# Altium PCB GTV4.0-V16_Lite.PcbDoc (part 1 of 7)
Units mil, origin at the board's own origin, x right, y up, seen from the top; angles counter-clockwise.
Board outline 5582.68 x 4389.76 mil, 4 copper layers (Top Layer, Layer 1, Layer 2, Bottom Layer), stack 62.631 mil thick; 269 components, 191 nets, 849 pads, 375 vias.
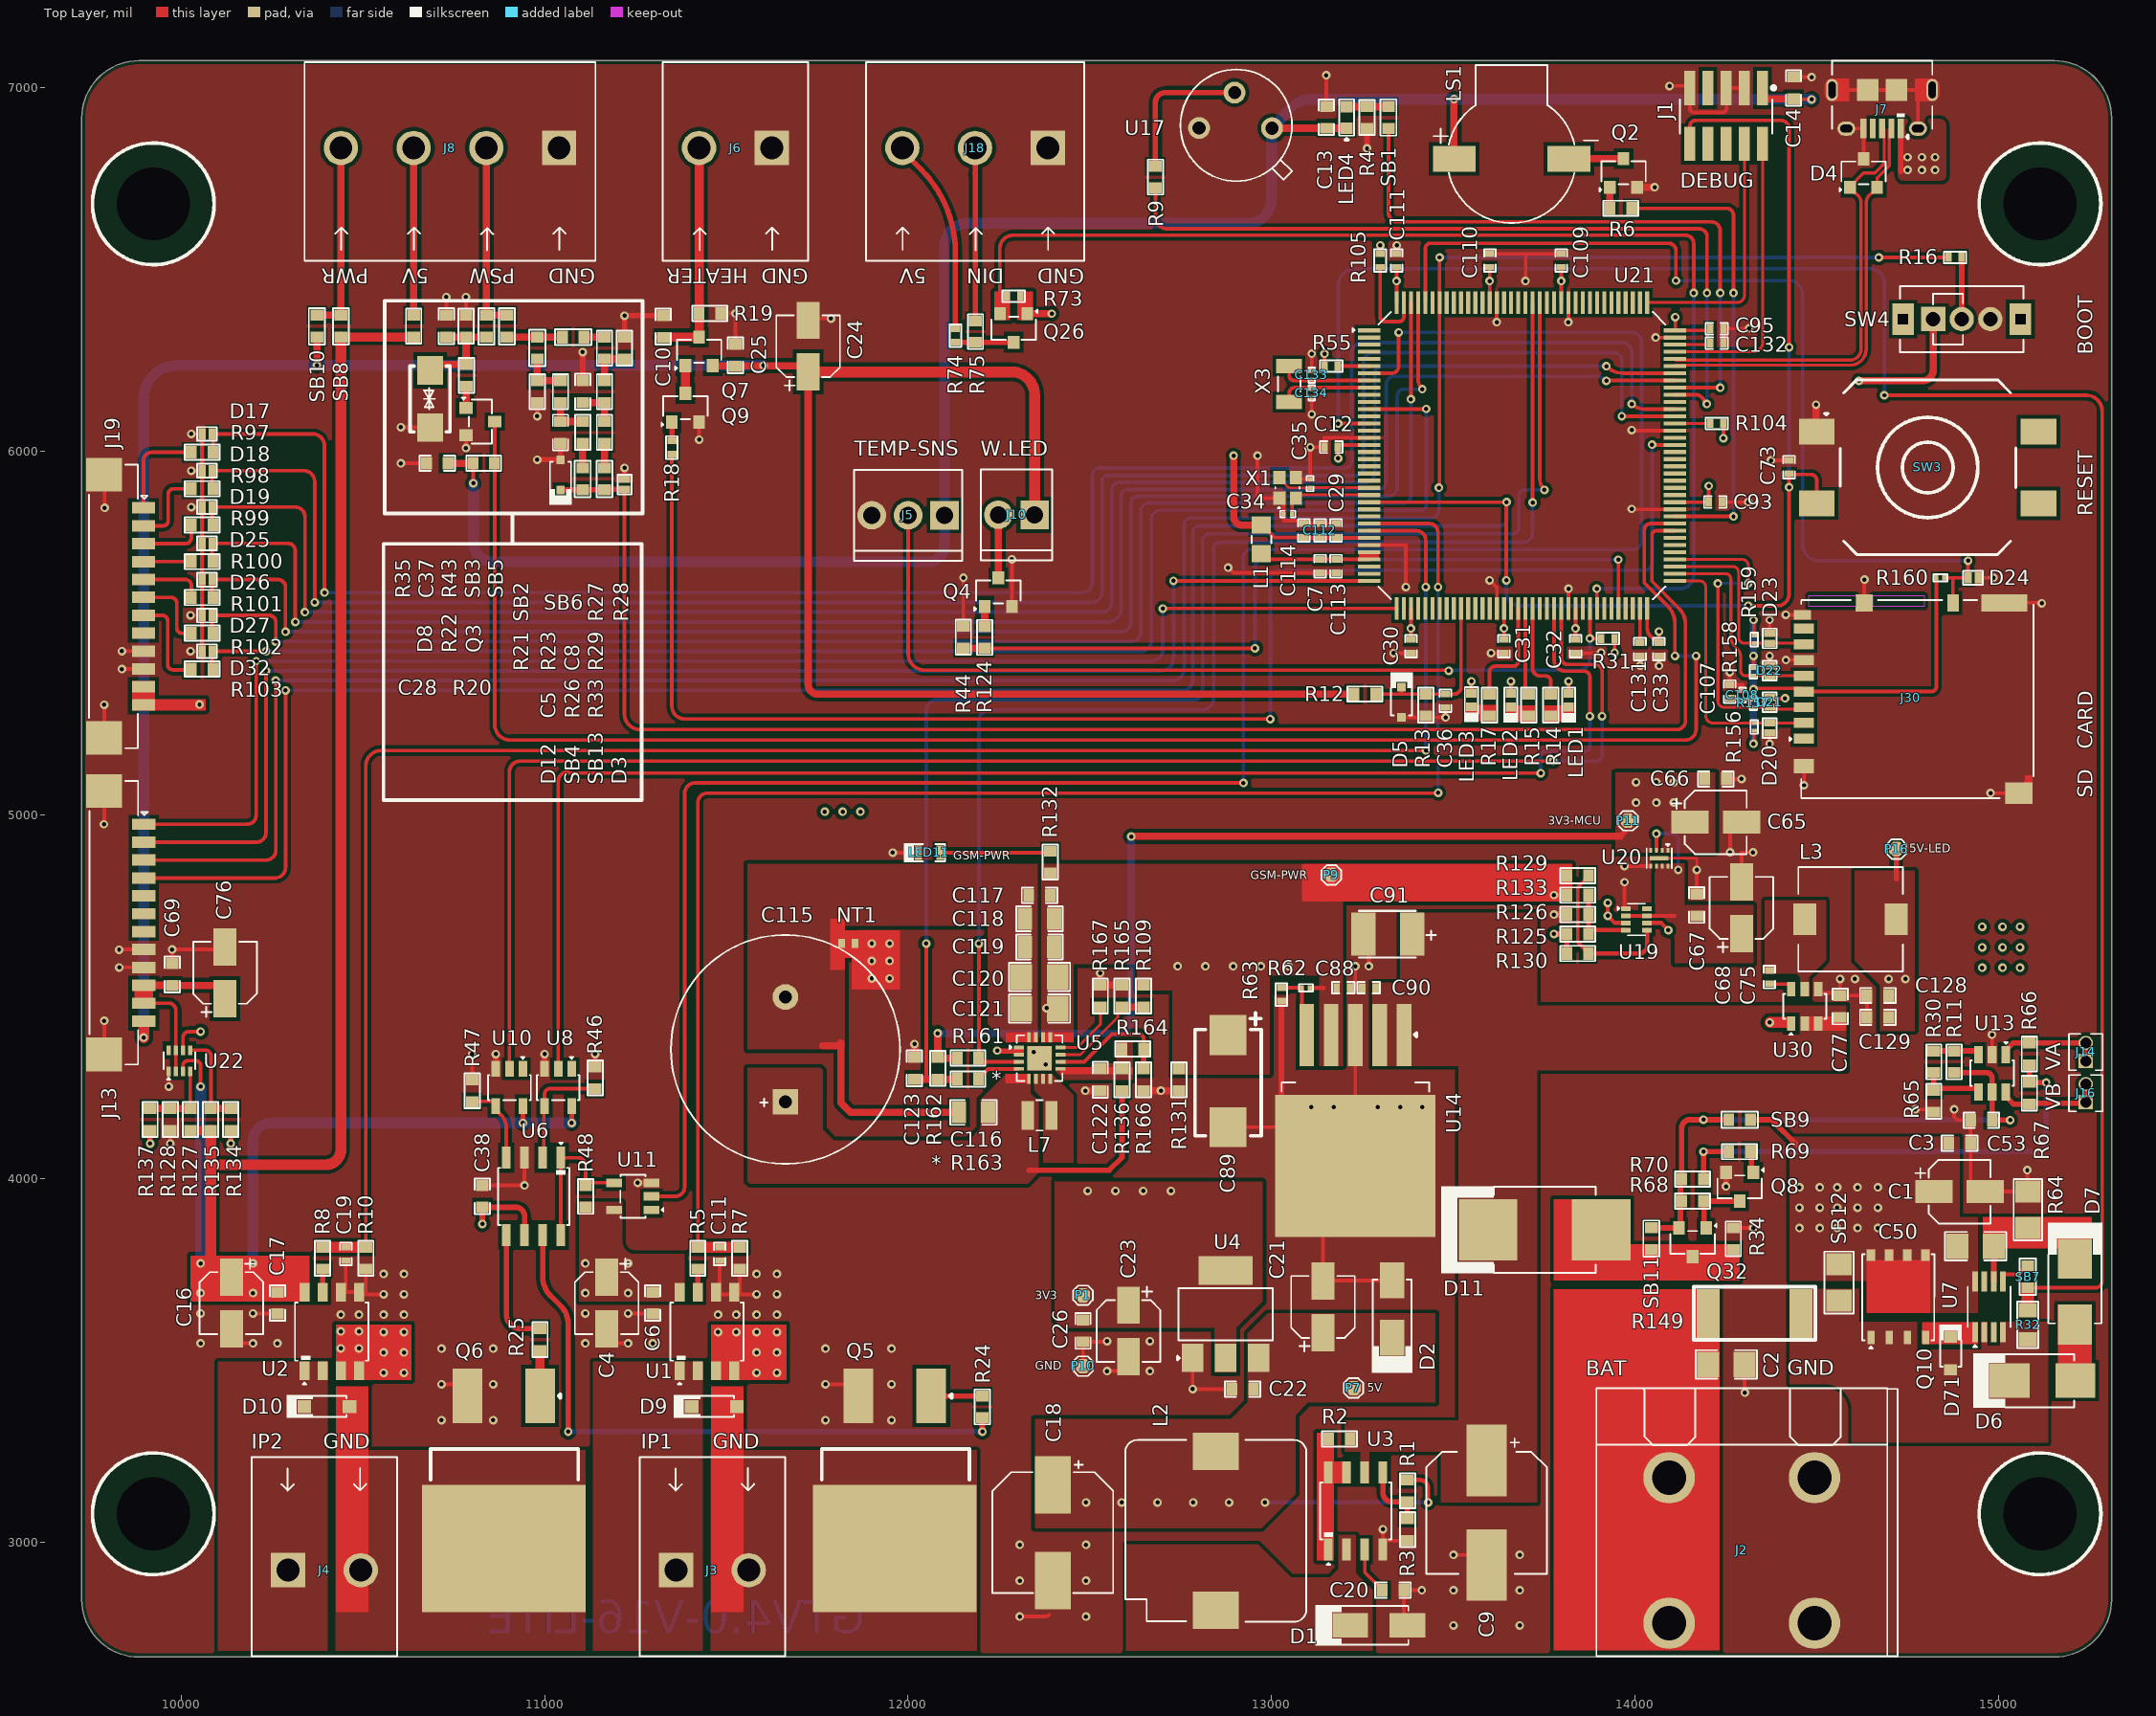
[diagram p0: Top Layer view]
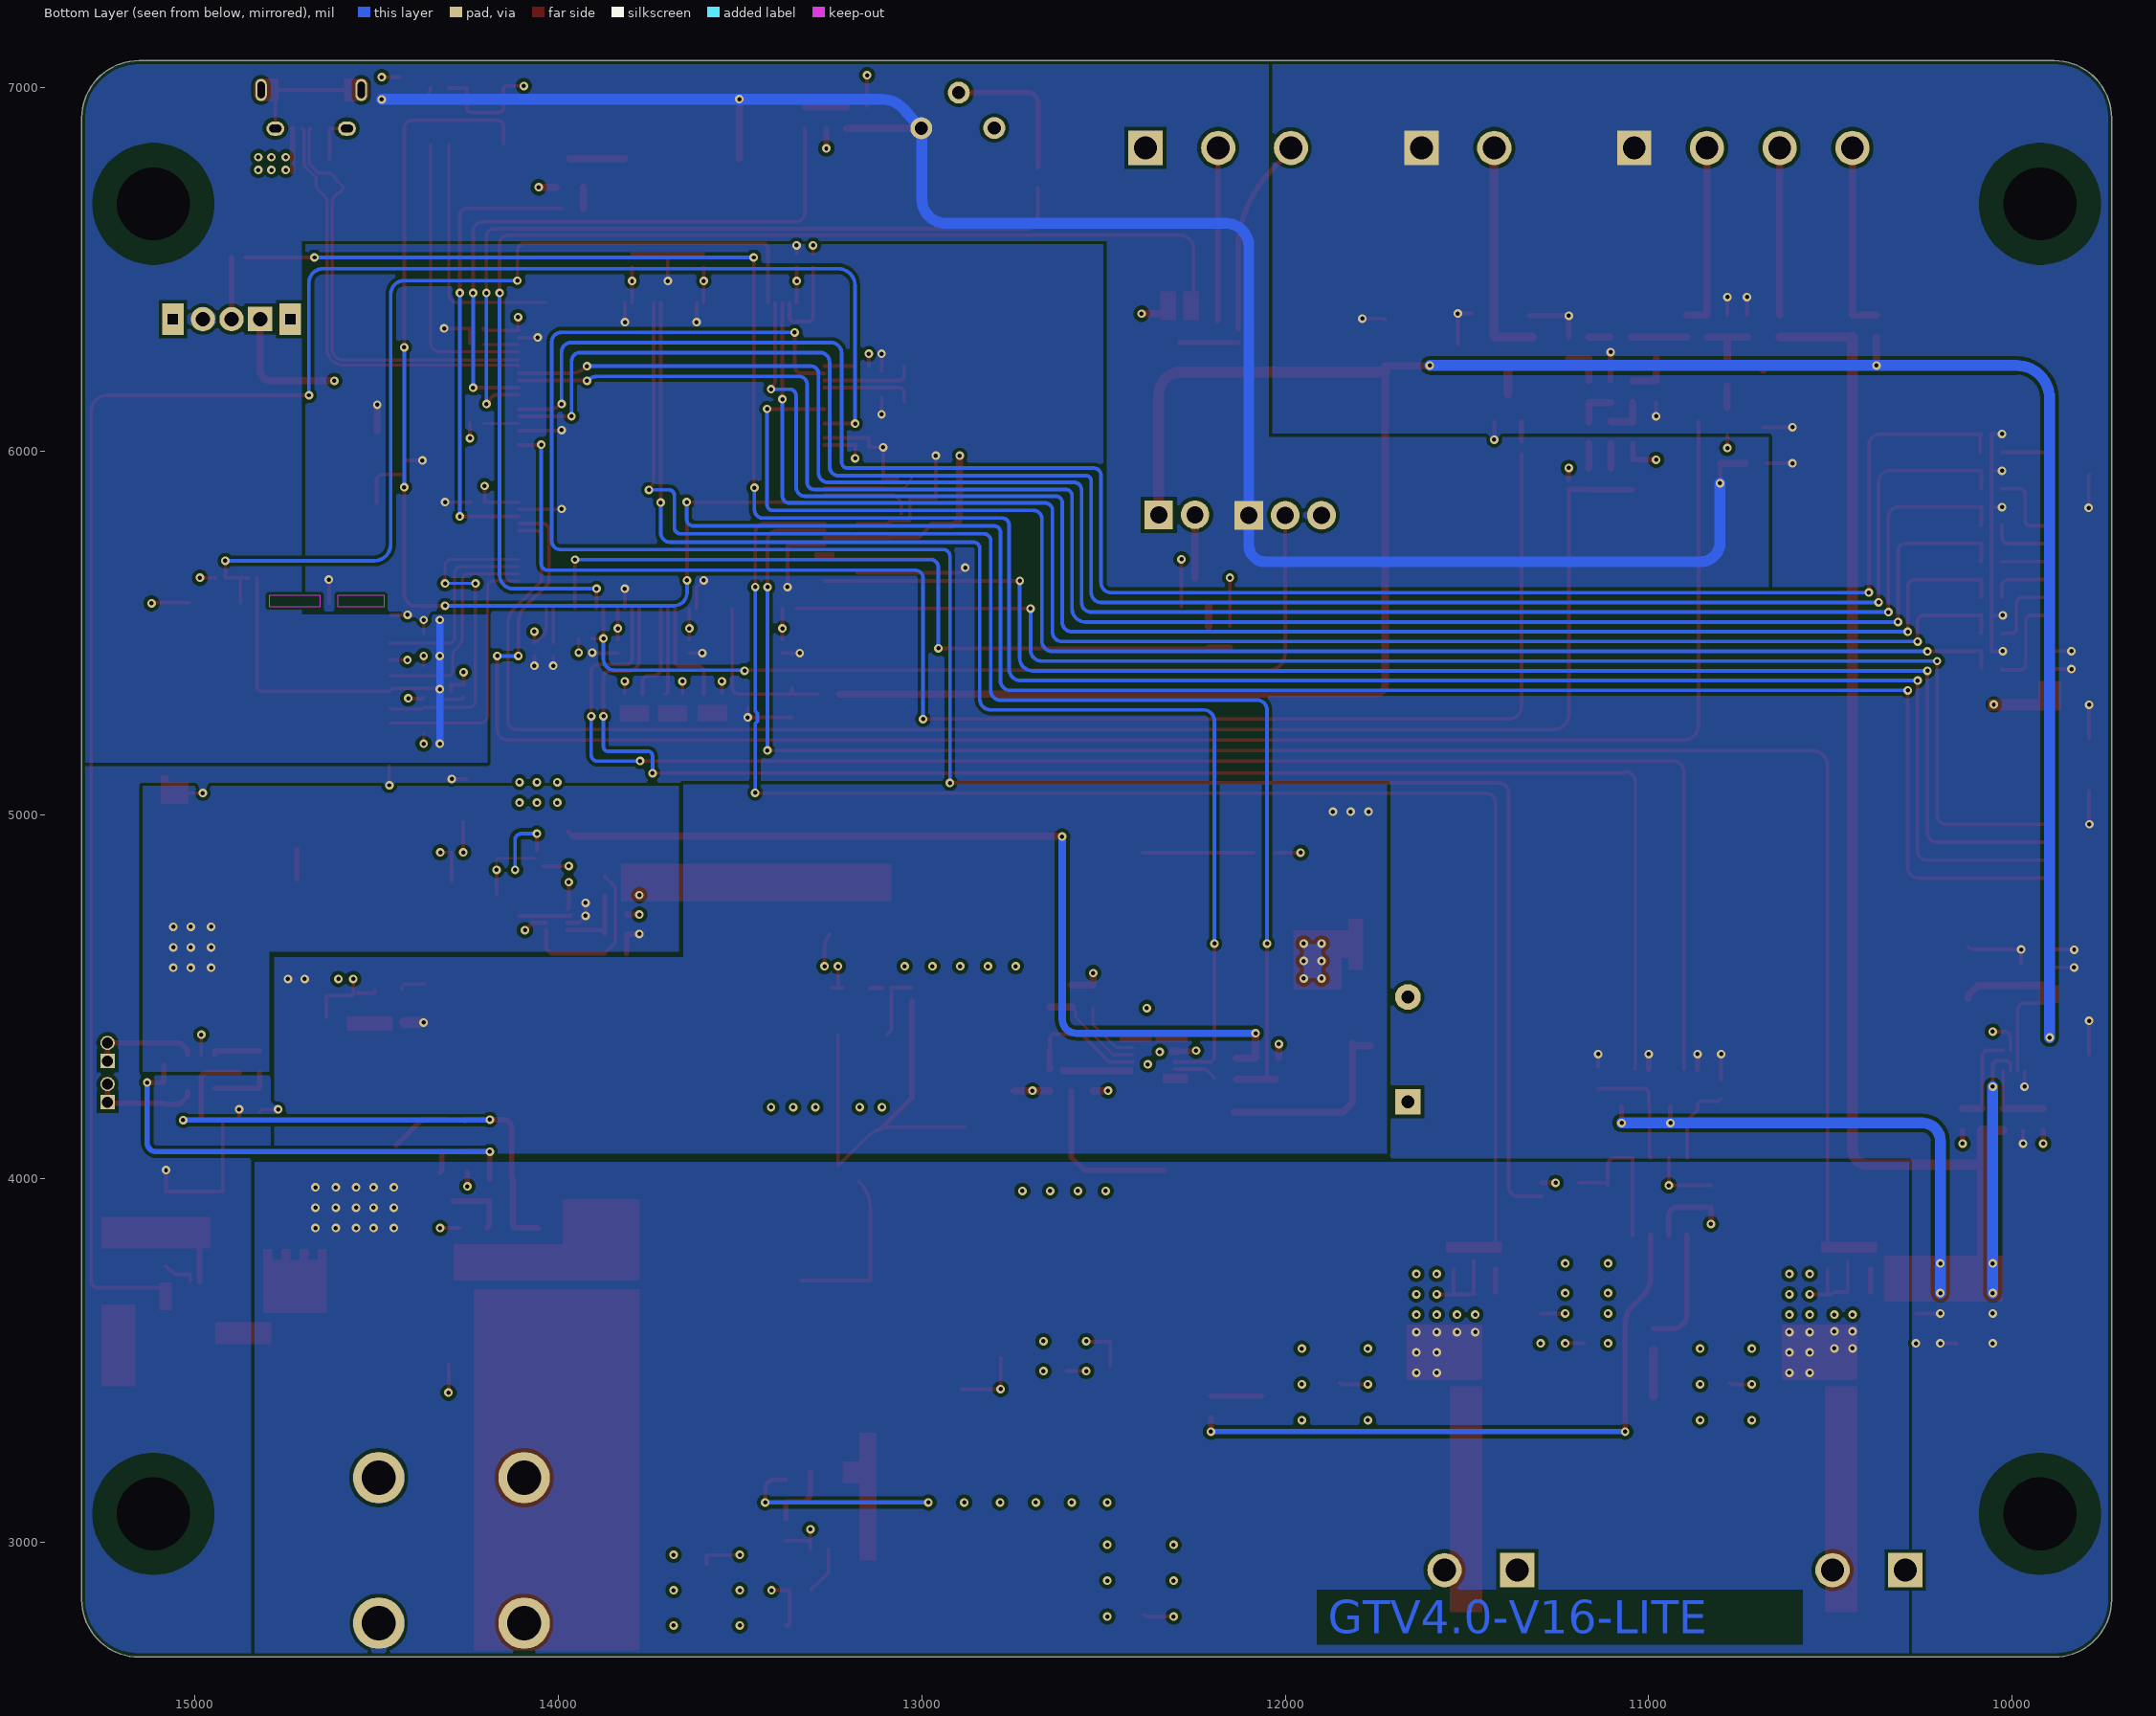
[diagram p1: Bottom Layer view, seen from below]
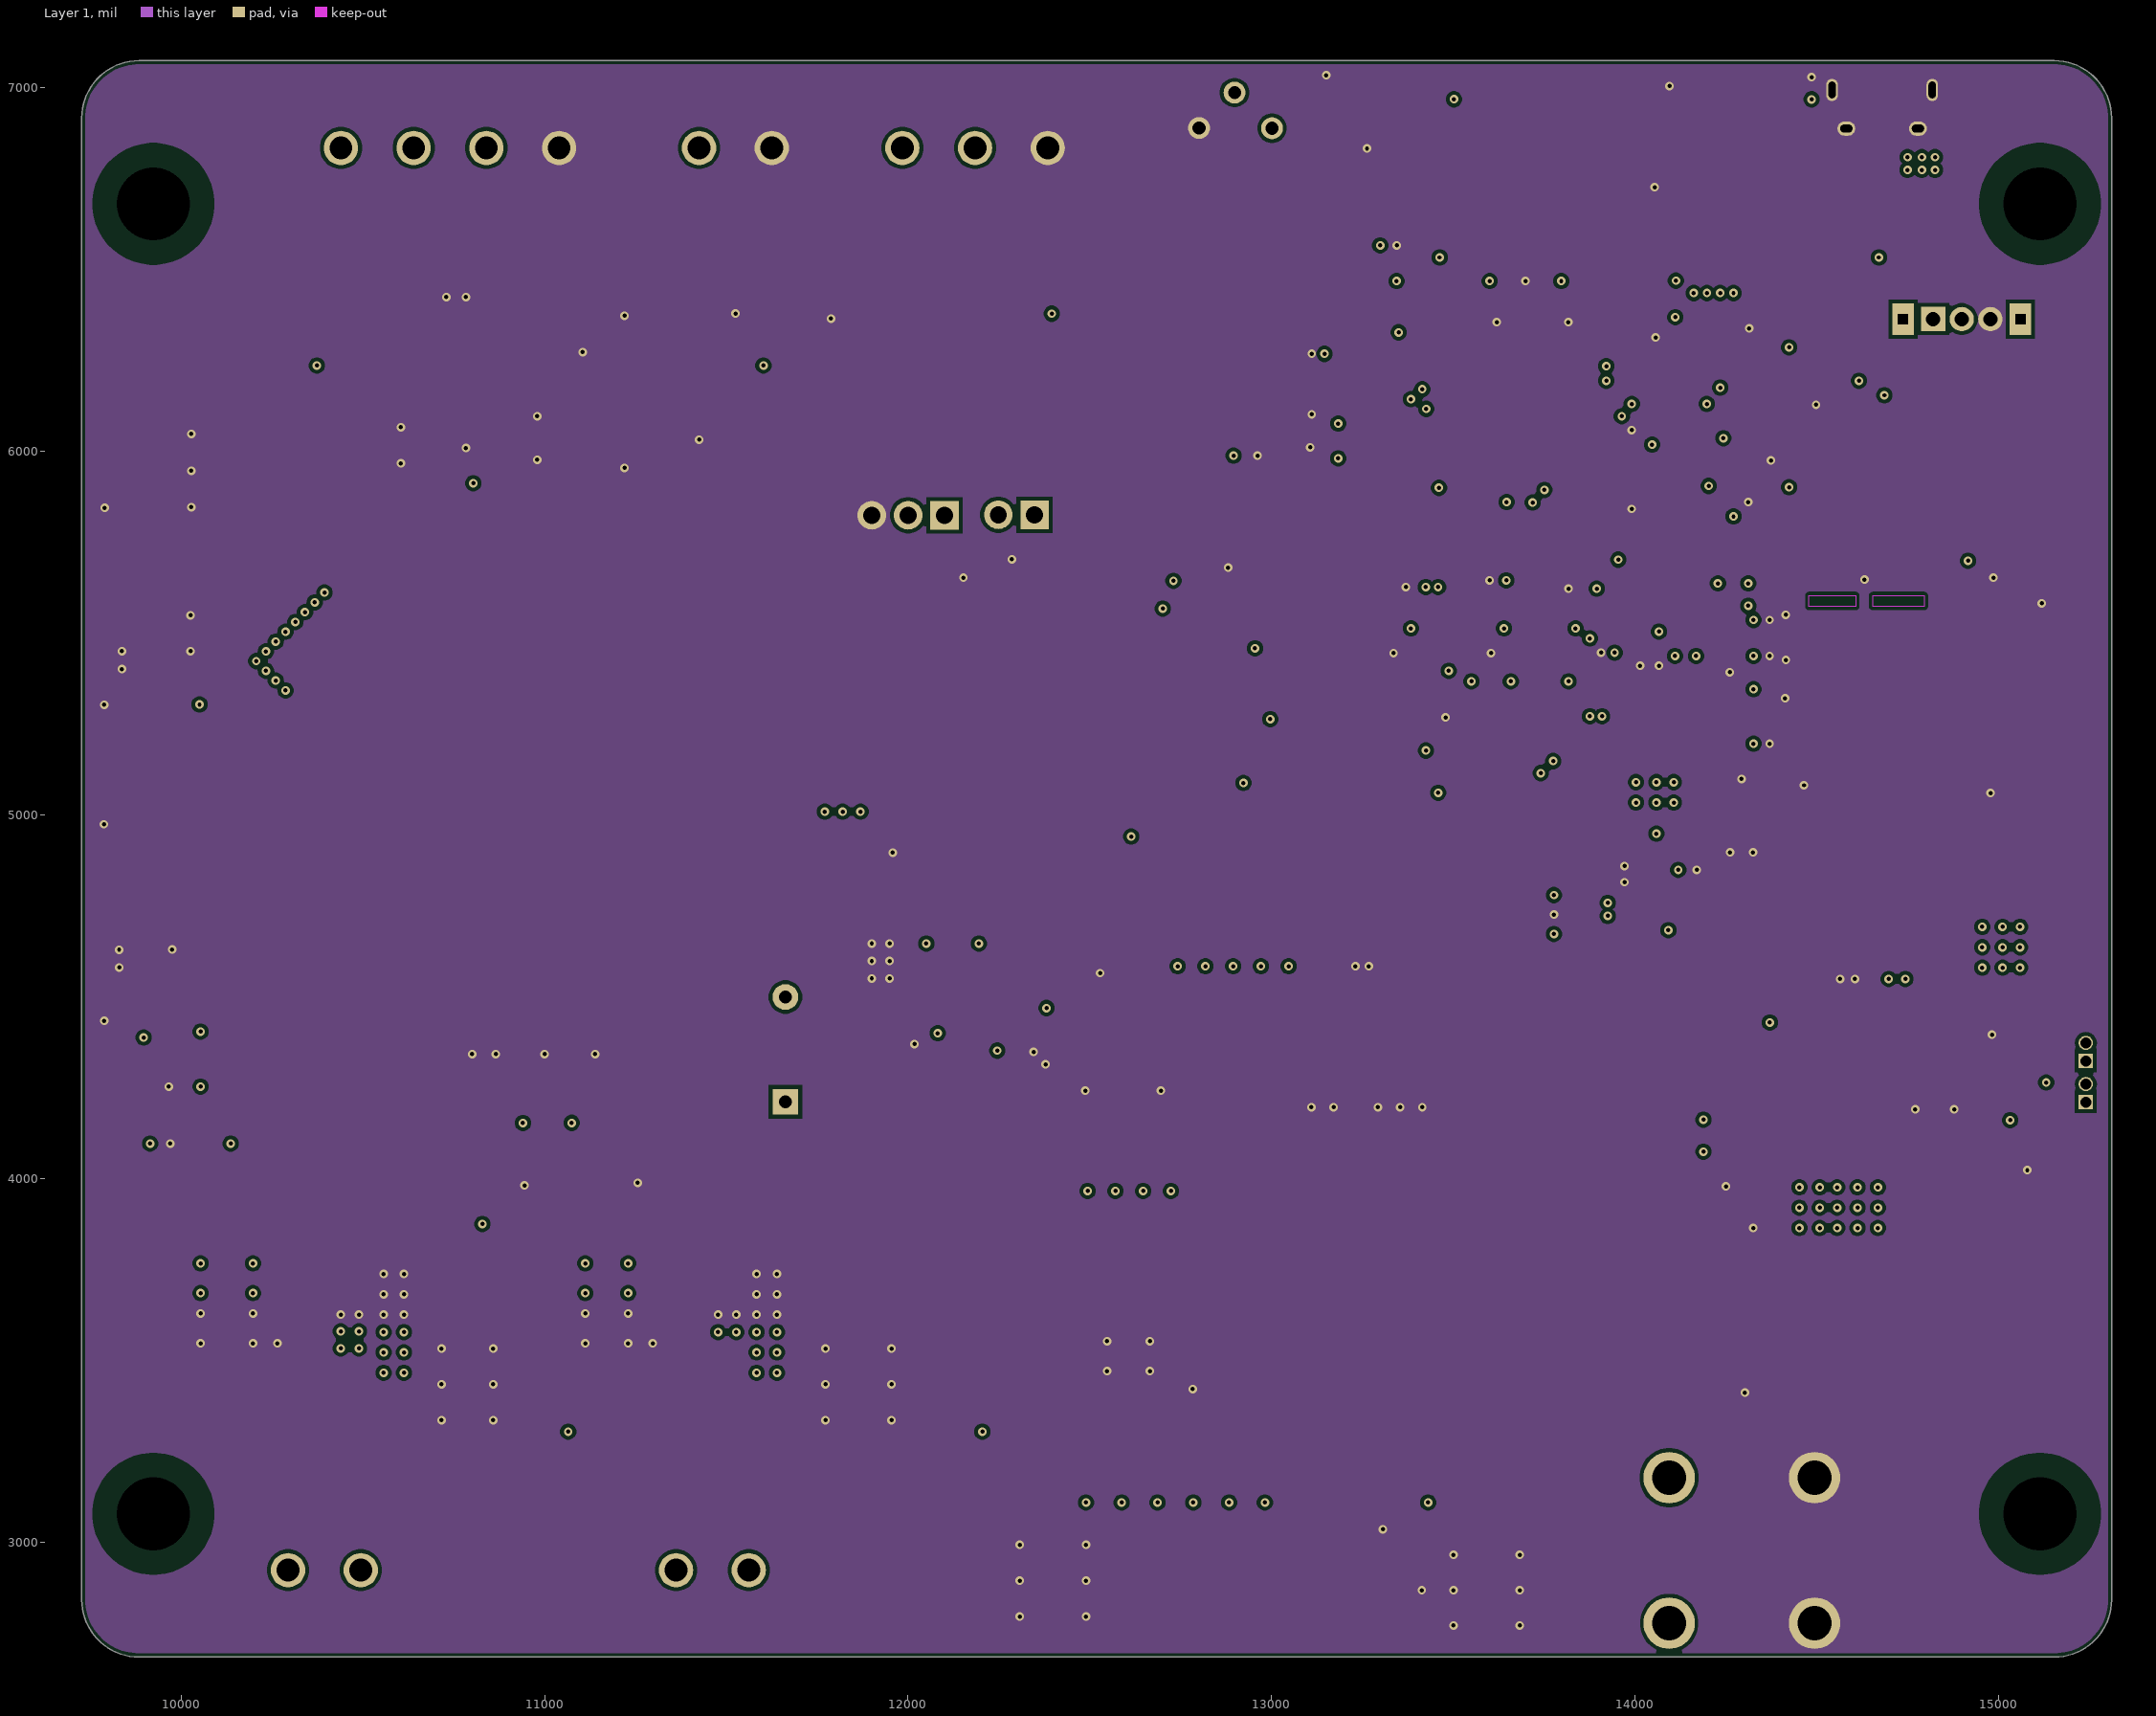
[diagram p2: Layer 1]
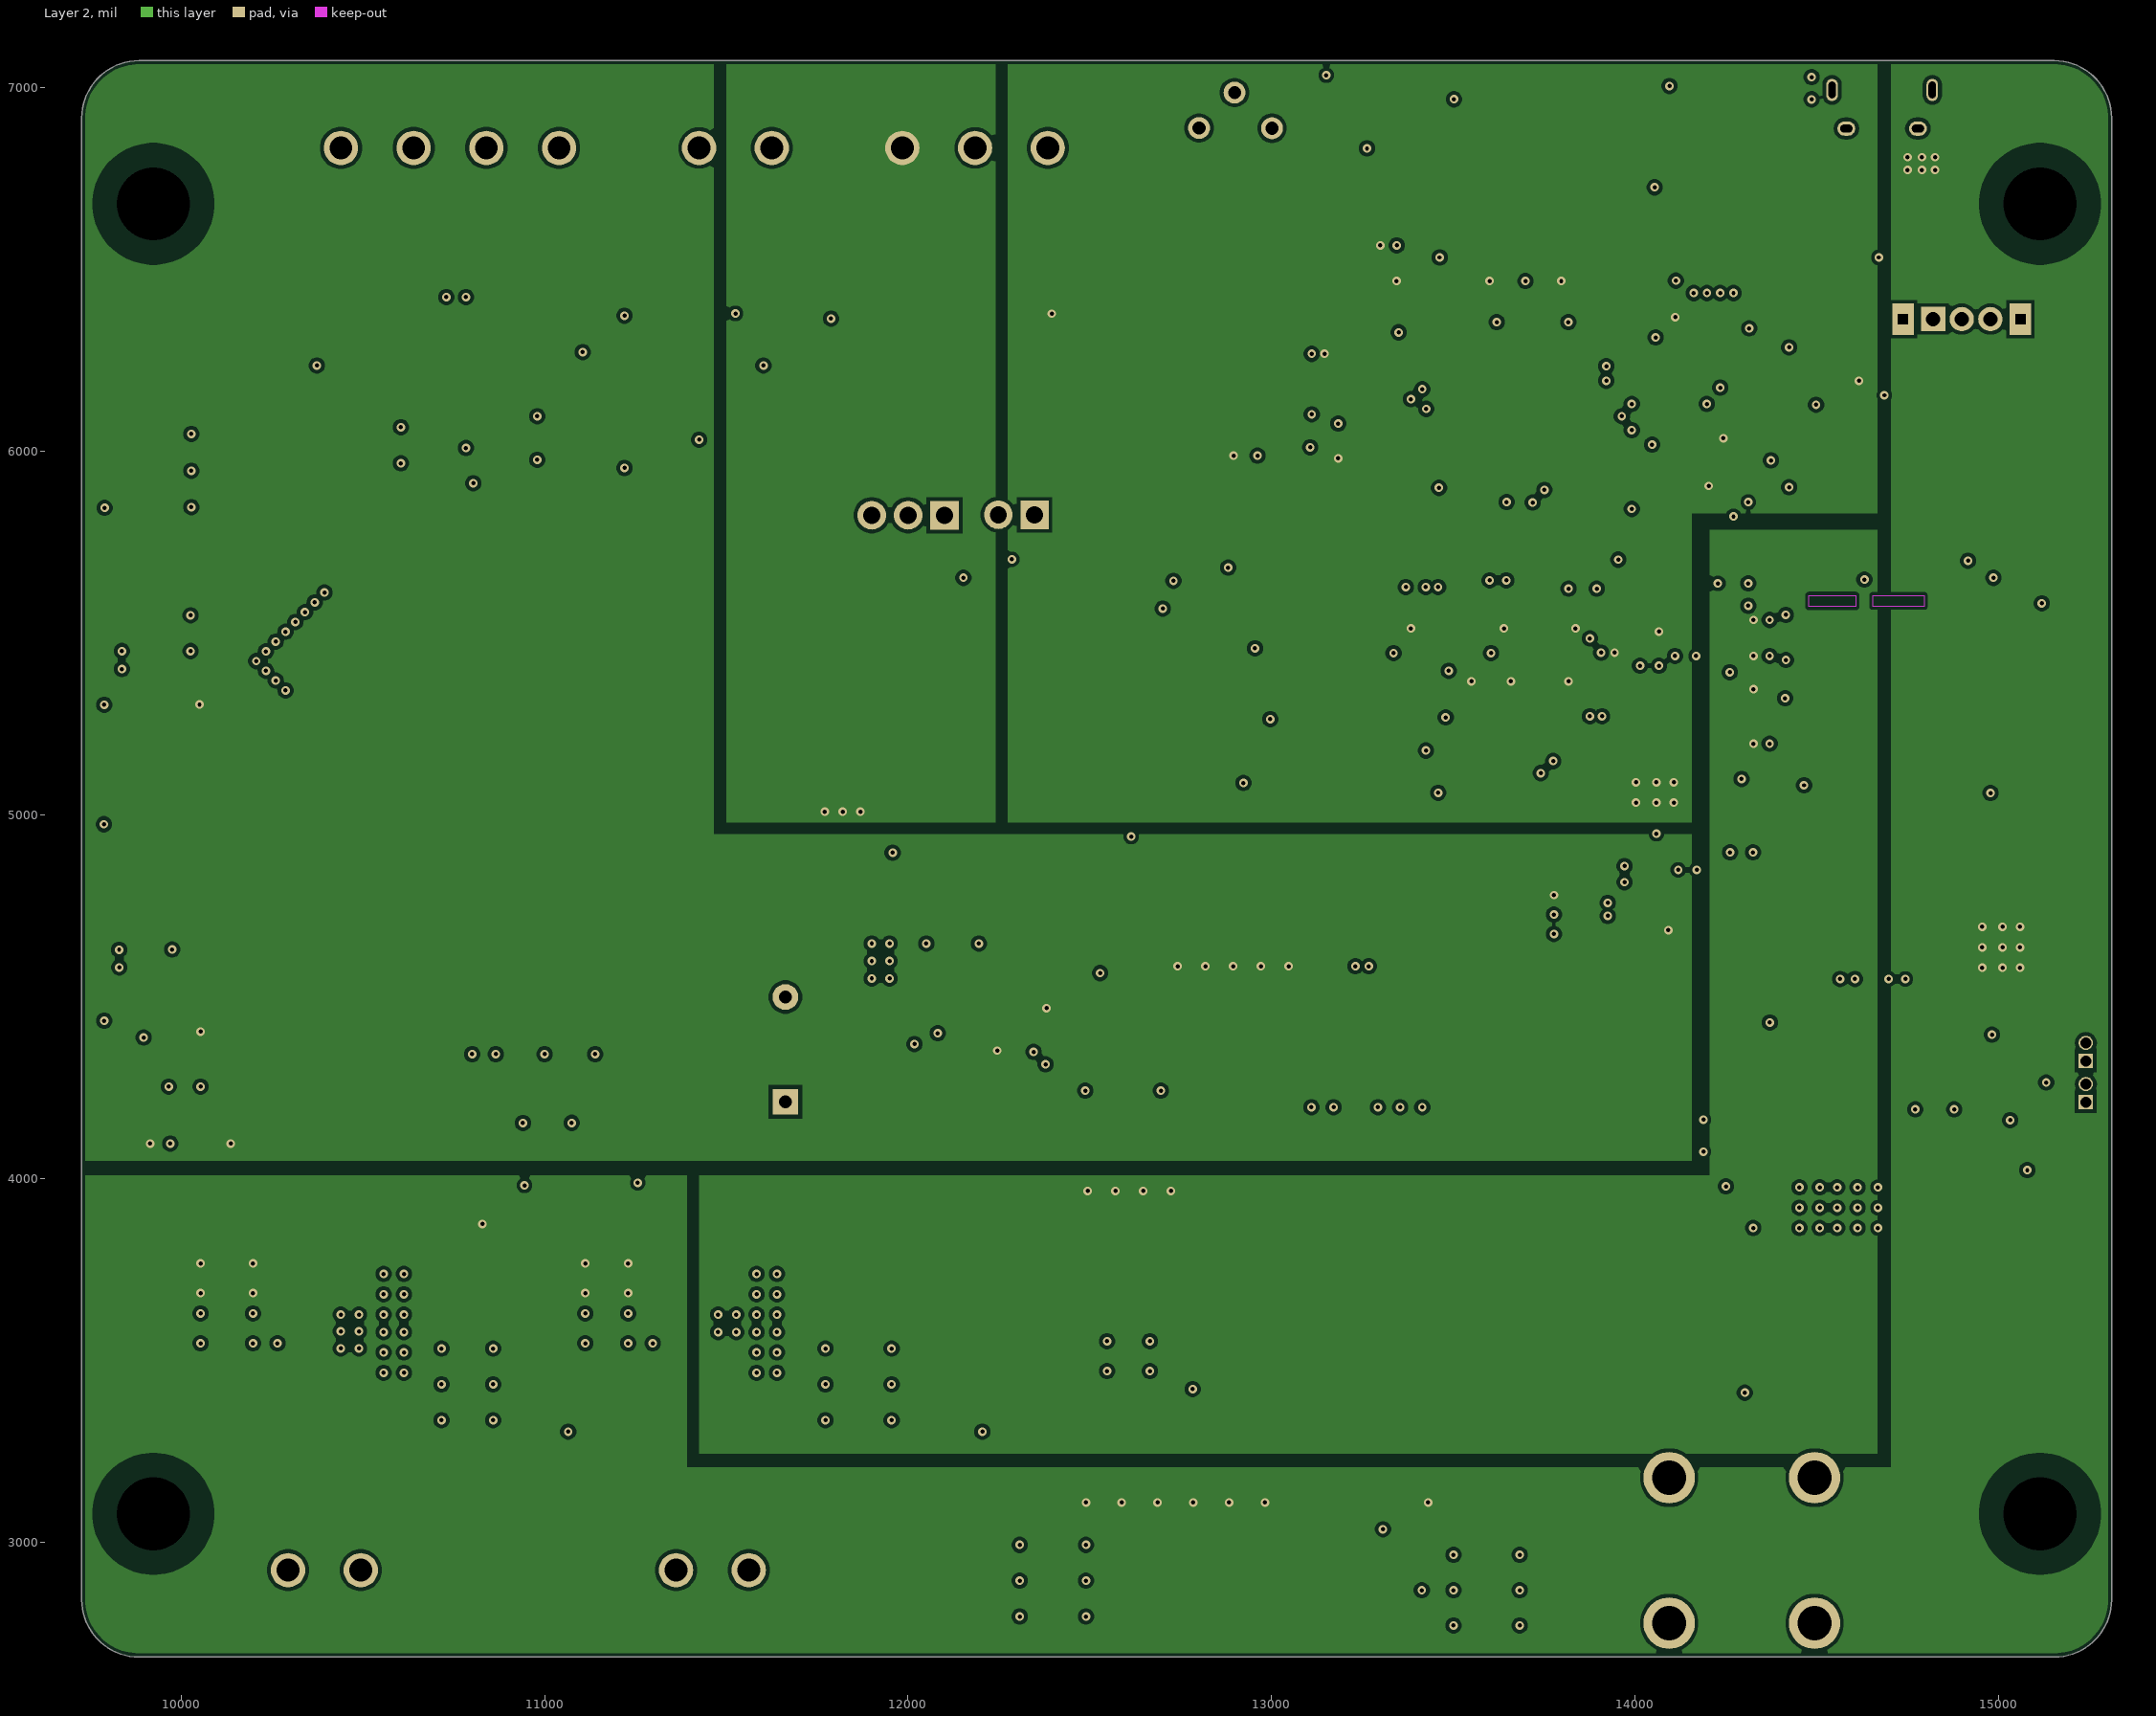
[diagram p3: Layer 2]
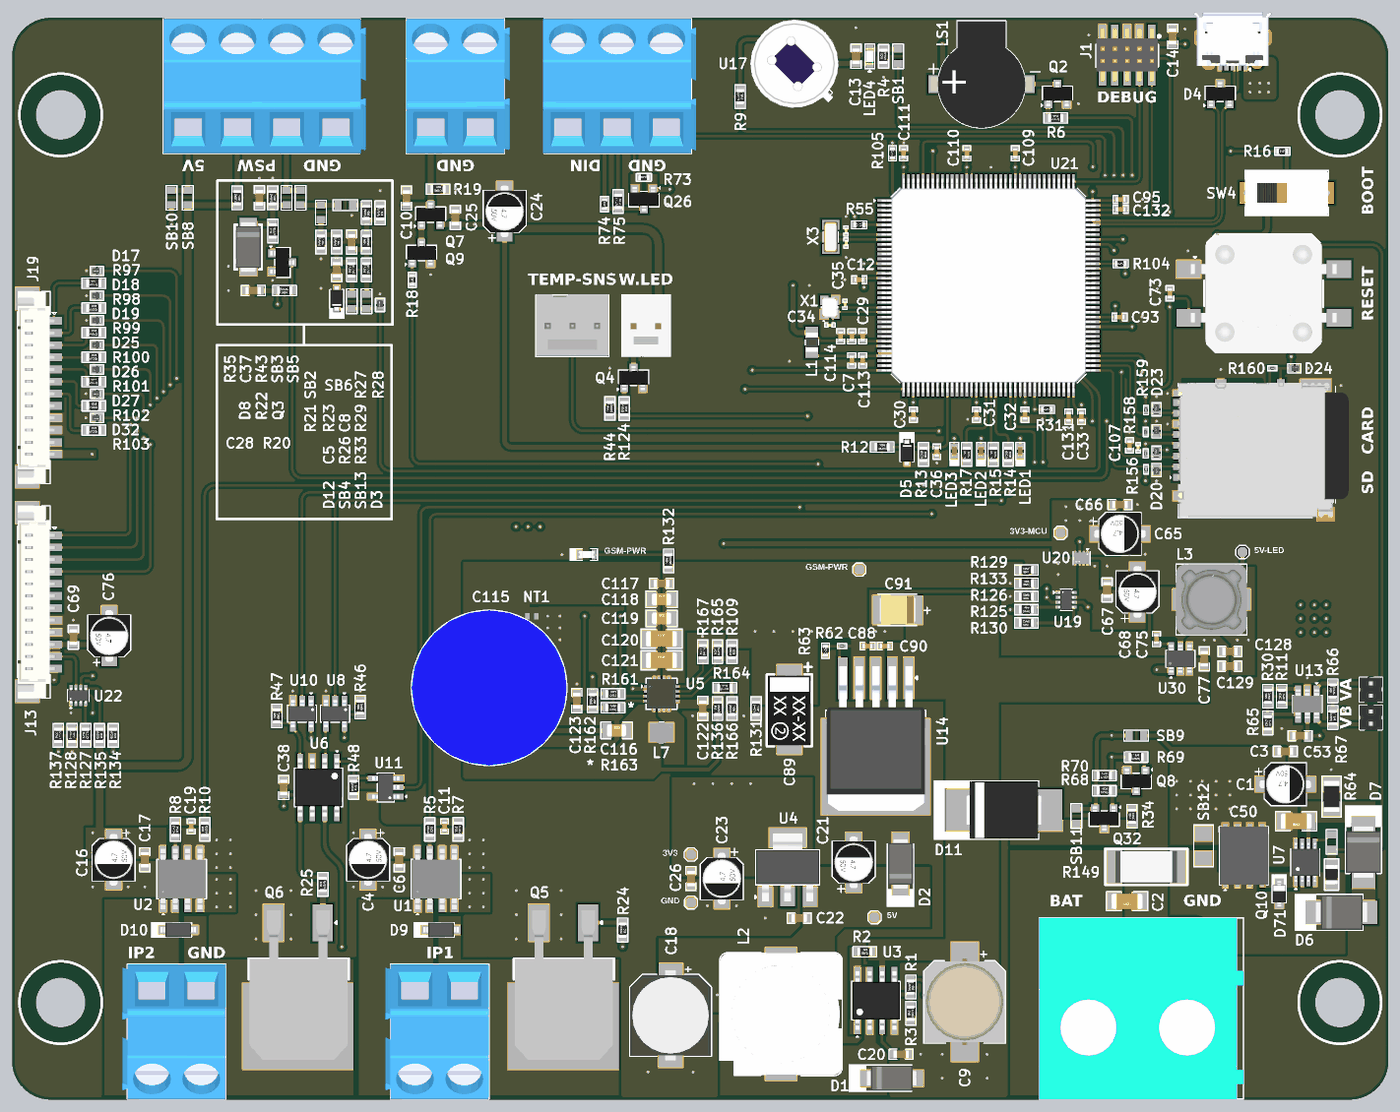
[diagram p6: 3D render of the assembled board from above, using the file's embedded part models]

## Layer stack, top to bottom
Top Solder: solder mask 0.4, Solder Resist, Dk 3.5
Top Layer: signal copper 1.378
Dielectric 2: prepreg 8.284, PP-006, Dk 4.4
Layer 1: signal copper 0.689
Dielectric 1: core 41.929, FR-4, Dk 4.6
Layer 2: signal copper 0.689
Dielectric 3: prepreg 8.284, PP-006, Dk 4.4
Bottom Layer: signal copper 1.378
Bottom Solder: solder mask 0.4, Solder Resist, Dk 3.5

## Board outline
9727.15,2842.78 9727.15,6917.58 cw(c9884.63,6917.58) 9884.63,7075.06 15152.35,7075.06 cw(c15152.35,6917.58) 15309.83,6917.58 15309.83,2842.78 cw(c15152.35,2842.78) 15152.35,2685.3 9884.63,2685.3 cw(c9884.63,2842.78)

## Design rules (kind name [scope] priority, off if disabled: settings)
BoardOutlineClearance [All] p1: gap=0 ignorepadtopadclearanceinfootprint=FALSE except(10: Poly-OutlineEdge)
Clearance Clearance_1 [InDifferentialPair('USB_D')] p1: gap=10 ignorepadtopadclearanceinfootprint=TRUE except(5: Arc-Arc Arc-Track Arc-SMDPad Track-Track Track-SMDPad)
Clearance [All] p2: gap=10 ignorepadtopadclearanceinfootprint=TRUE except(6: Arc-Arc Arc-Track Arc-SMDPad Track-Track Track-SMDPad; 8: Track-Fill SMDPad-Fill)
ComponentClearance [All] p1: gap=0 collisioncheckmode=3 verticalgap=0 showdistances=FALSE
DiffPairsRouting 120R [InDifferentialPair('RS485-1') or InDifferentialPair('RS485-2')] p1: maxlimit=10 minlimit=10 mostfreqgap=10 toplayer_minwidth=7 toplayer_maxwidth=7 toplayer_prefwidth=7 bottomlayer_minwidth=7 bottomlayer_maxwidth=7 bottomlayer_prefwidth=7 impedanceprofiledriven=TRUE impedanceprofileid={9646D7D8-A396-4A7E-908E-0A67BAA28A3D} impedanceprofilevalue=120.000000 maxuncoupledlength=500
DiffPairsRouting 90R [InDifferentialPair('USB_D')] p2: maxlimit=10 minlimit=5 mostfreqgap=10 toplayer_maxgap=5 toplayer_prefgap=5 toplayer_minwidth=9 toplayer_maxwidth=9 toplayer_prefwidth=9 bottomlayer_maxgap=5 bottomlayer_prefgap=5 bottomlayer_minwidth=9 bottomlayer_maxwidth=9 bottomlayer_prefwidth=9 impedanceprofiledriven=TRUE impedanceprofileid={838F8191-268A-4B1F-A68D-0EAB05C72438} impedanceprofilevalue=90.000000 maxuncoupledlength=500
Height [All] p1: minheight=0 maxheight=1377.95 prefheight=500
HoleSize [All] p1: absolutevalues=TRUE maxlimit=200.79 minlimit=1 maxpercent=80.000 minpercent=20.000
MatchedLengths "Schematic Matched Net Lengths" [InNetClass('USB_D')] p1: tolerance=50 checknetsindiffpair=TRUE checkdiffpairvsdiffpair=FALSE checkxsignals=FALSE checkothers=FALSE
MaxMinImpedance "Schematic Impedance Constraint" [InNetClass('USB_D')] p1: minimum=85.00 maximum=90.00
MinimumSolderMaskSliver [All] p1: minsoldermaskwidth=0
PolygonConnect [All] p1: connectstyle=Direct reliefconductorwidth=10 reliefentries=4 polygonreliefangle="90 Angle" airgapwidth=10
RoutingVias [All] p1: holewidth=11.81 width=23.62 viastyle="Through Hole" minholewidth=11.81 minwidth=23.62 maxholewidth=11.81 maxwidth=23.62
SilkToSilkClearance [All] p1: silktosilkclearance=0
SilkToSolderMaskClearance [IsPad] p1: minsilkscreentomaskgap=0 clearancetoexposedcopper=TRUE
SolderMaskExpansion [All] p1: expansion=4 istentingtop=FALSE
SupplyNets "Schematic Supply Nets_21" [InNet('BAT')] p1: voltage=0.000
SupplyNets "Schematic Supply Nets_20" [InNet('VCC#P')] p2: voltage=0.000
SupplyNets "Schematic Supply Nets_18" [InNet('VCC##12')] p3: voltage=0.000
SupplyNets "Schematic Supply Nets_17" [InNet('VIOUT_2')] p4: voltage=0.000
SupplyNets "Schematic Supply Nets_16" [InNet('5V-LED')] p5: voltage=0.000
SupplyNets "Schematic Supply Nets_15" [InNet('5V')] p6: voltage=0.000
SupplyNets "Schematic Supply Nets_14" [InNet('VCC#12')] p7: voltage=0.000
SupplyNets "Schematic Supply Nets_13" [InNet('VCC#M')] p8: voltage=0.000
SupplyNets "Schematic Supply Nets_12" [InNet('VCC')] p9: voltage=0.000
SupplyNets "Schematic Supply Nets_9" [InNet('VCC_M')] p10: voltage=0.000
SupplyNets "Schematic Supply Nets_8" [InNet('PGND')] p11: voltage=0.000
SupplyNets "Schematic Supply Nets_7" [InNet('VIOUT_1')] p12: voltage=0.000
SupplyNets "Schematic Supply Nets_5" [InNet('3V3_MCU')] p13: voltage=0.000
SupplyNets "Schematic Supply Nets_3" [InNet('GSM_PWR')] p14: voltage=0.000
SupplyNets "Schematic Supply Nets_1" [InNet('GND')] p15: voltage=0.000
SupplyNets "Schematic Supply Nets" [InNet('3V3')] p16: voltage=0.000
Width Width_1 [InNet('ANT')] p1: maxlimit=13.1 minlimit=7 preferedwidth=13.1 impedanceprofiledriven=TRUE impedanceprofileid={C44CD197-F075-4C9D-AF99-28623E12255F} impedanceprofilevalue=50.000000 minimp=50.000000 maximp=50.000000 favimp=50.000000
Width [All] p2: maxlimit=39.37 minlimit=7 preferedwidth=10 midlayer1_minwidth=10 midlayer1_maxwidth=10 midlayer2_minwidth=10 midlayer2_maxwidth=10 bottomlayer_minwidth=7.99 minimp=50.000000 maximp=50.000000 favimp=50.000000
23 further rules are at their usual default settings.

## Classes and differential pairs
differential pair class USB_D_Lines: USB_D
net class USB_D: USB_D_N USB_D_P
component class WIFI_Display_Sheet: C69 C76 J13 R127 R128 R134 R135 R137 U22
component class Voltage_Monitoring_Section: C53 J14 J16 Q8 Q32 R11 R30 R34 R65 R66 R67 R68 R69 R70 SB9 SB11 U13
component class SD-Card-Sheet: C107 C108 D20 D21 D22 D23 D24 J30 R156 R157 R158 R159 R160
component class "Reverse Protection_Section": C1 C2 C3 C50 D6 D7 D71 J2 Q10 R32 R64 R149 SB7 SB12 U7
component class Regulator_Section: C9 C18 C20 C21 C22 C23 C26 C65 C66 C67 C68 C75 C77 C88 C89 C90 C91 C115 C116 C117 C118 C119 C120 C121 C122 C123 C128 C129 D1 D2 D11 L2 L3 L7 LED11 NT1 P1 P7 P9 P10 P11 P16 R1 R2 R3 R62 R63 R109 R125 R126 R129 R130 R131 R132 R133 R136 R161 R162 R163 R164 R165 R166 R167 U3 U4 U5 U14 U19 U20 U30
component class Onboard_Sensor_Section: C5 C8 C13 C14 C28 C37 D3 D4 D8 D12 J1 J5 J7 J8 LED4 LS1 Q2 Q3 R4 R6 R9 R20 R21 R22 R23 R26 R27 R28 R29 R33 R35 R43 SB1 SB2 SB3 SB4 SB5 SB6 SB8 SB10 SB13 U17
component class LED_Section: J10 J18 Q4 Q26 R44 R73 R74 R75 R124
component class Heater_Section: C10 C24 C25 J6 Q7 Q9 R18 R19
component class GSM_Sheet: D17 D18 D19 D25 D26 D27 D32 J19 R97 R98 R99 R100 R101 R102 R103
component class Gate_Driver_Section: C38 D9 D10 J3 J4 Q5 Q6 R24 R25 R46 R47 R48 U6 U8 U10 U11
component class Current_Sense_Section: C4 C6 C11 C16 C17 C19 R5 R7 R8 R10 U1 U2
component class Controller_Section: C7 C12 C29 C30 C31 C32 C33 C34 C35 C36 C73 C93 C95 C109 C110 C111 C112 C113 C114 C131 C132 C133 C134 D5 L1 LED1 LED2 LED3 R12 R13 R14 R15 R16 R17 R31 R55 R104 R105 SW3 SW4 U21 X1 X3
differential pair USB_D: +USB_D_P -USB_D_N

## Components (designator, comment, footprint, x,y, rotation, side; value= is the part's Value field where it differs from the comment)
C1 "10uF" RVT1E100M0405_ 14891.83,3965 r0 top
C2 "0.1uF" Cap-1206 14250,3490 r180 top
C3 "1uF" Cap-0603 14891.83,4098 r0 top
C4 "10uF" RVT1E100M0405_ 11171,3658.54 r270 top
C5 "1uF" Cap-0603 11044,6052.6 r270 top
C6 "0.1uF" Cap-0603 11297.56,3658.54 r270 top
C7 "1uF" Cap-0402 13133,5685.07 r270 top
C8 "1uF" Cap-0603 11105,6165 r270 top
C9 "100uF" UWX1E101MCL1GB_ 13591,3082 r270 top
C10 "0.1uF" Cap-0603 11326.6,6344 r270 top
C11 "1nF" Cap-0402 11481.56,3793.5 r270 top
C12 "0.1uF" Cap-0402 13163.5,6012.53 r180 top
C13 "0.1uF" Cap-0603 13150.5,6919.4 r90 top
C14 "0.1uF" Cap-0603 14435,7000 r90 top
C16 "10uF" RVT1E100M0405_ 10139,3658.54 r270 top
C17 "0.1uF" Cap-0603 10265.56,3658.54 r270 top
C18 "470uF" EEE-FT1E471GP_ 12398,3027 r270 top
C19 "1nF" Cap-0402 10453.34,3793.5 r270 top
C20 "470pF" Cap-0603 13333.48,2869 r180 top
C21 "10uF" RVT1E100M0405_ 13141,3647.91 r90 top
C22 "0.1uF" Cap-0603 12920,3422 r180 top
C23 "10uF" RVT1E100M0405_ 12606,3582 r270 top
C24 "10uF" RVT1E100M0405_ 11725,6290 r90 top
C25 "1uF" Cap-0603 11525,6265 r270 top
C26 "0.1uF" Cap-0603 12481,3582 r270 top
C28 "0.1uF" Cap-0603 10705,5968 r0 top
C29 "0.1uF" Cap-0402 13177,5783 r90 top
C30 "0.1uF" Cap-0402 13382.88,5464.5 r270 top
C31 "0.1uF" Cap-0402 13638.79,5464.5 r270 top
C32 "0.1uF" Cap-0402 13835.64,5464.5 r270 top
C33 "0.1uF" Cap-0402 14065,5456.54 r270 top
C34 "15pF" Cap-0201 13044.28,5828.32 r0 top
C35 "15pF" Cap-0201 13105.5,5912.23 r270 top
C36 "0.1uF" Cap-0402 13478.37,5314.8 r90 top
C37 "1uF" Cap-0603 10730,6345 r90 top
C38 "0.1uF" Cap-0603 10829,3952 r90 top
C50 "0.047uF" Cap-1206 14935.75,3815 r180 top
C53 "0.1uF" Cap-0603 14951.83,4161.77 r180 top
C65 "10uF" RVT1E100M0405_ 14221.13,4981 r0 top
C66 "0.1uF" Cap-0603 14221.13,5100 r180 top
C67 "0.1uF" Cap-0603 14169,4753.3 r270 top
C68 "10uF" RVT1E100M0405_ 14292,4745.43 r90 top
C69 "0.1uF" Cap-0603 9976,4562 r270 top
C73 "0.1uF" Cap-0402 14423,5957.43 r270 top
C75 "0.1uF" Cap-0402 14369,4554.99 r270 top
C76 "10uF" RVT1E100M0405_ 10121,4566.87 r90 top
C77 "10uF" Cap-0603 14563,4474.24 r270 top
C88 "0.1uF" Cap-0402 13197,4525.6 r180 top
C89 "330uF" Case-E 12880,4395.6 r270 top
C90 "0.1uF" Cap-0402 13267,4525.6 r0 top
C91 "100uF" Case-B 13319.58,4673 r180 top
C93 "0.1uF" Cap-0402 14220,5861.05 r0 top
C95 "0.1uF" Cap-0402 14224,6338 r0 top
C107 "10uF" Cap-0402 14259.84,5340.3 r270 top
C108 "0.1uF" CAP-0201 14295,5330.48 r270 top
C109 "0.1uF" Cap-0402 13796.64,6525.5 r90 top
C110 "0.1uF" Cap-0402 13600,6525.5 r90 top
C111 "0.1uF" Cap-0402 13343.51,6525.5 r90 top
C112 "10uF" Cap-0402 13133,5783 r90 top
C113 "0.1uF" Cap-0402 13177,5685.07 r270 top
C114 "0.1uF" Cap-0402 13088,5783 r90 top
C115 "25F" SCCU25B256SRB 11662.49,4356.12 r90 top
C116 "22uF" Cap-0805 12179.49,4182.93 r0 top
C117 "1uF" Cap-0603 12361.49,4780.01 r0 top
C118 "22uF" Cap-0805 12361.49,4715.51 r0 top
C119 "22uF" Cap-0805 12361.49,4638.01 r0 top
C120 "47uF" Cap-1206 12361.49,4555.51 r0 top
C121 "47uF" Cap-1206 12361.49,4468.01 r0 top
C122 "0.47uF" Cap-0603 12528.49,4272.49 r90 top
C123 "2.2nF" Cap-0603 12017.49,4304.01 r270 top
C128 "22uF" Cap-0603 14666.97,4504.24 r0 top
C129 "22uF" Cap-0603 14666.97,4444.24 r0 top
C131 "2.2uF" Cap-0402 14012.73,5456.54 r90 top
C132 "2.2uF" Cap-0402 14224,6298.12 r180 top
C133 "15pF" Cap-0201 13110,6210.5 r270 top
C134 "15pF" Cap-0201 13110,6161.2 r90 top
D1 "SS24A" SMA 13294.74,2772 r0 top
D2 "1SMA5930BT3G" SMA 13331,3642 r90 top
D3 "LESD8D3.3CAT5G" "SOD-882 Bi Directional" 11220,5910 r270 top
D4 "ESD5302F-3/TR" Sot-23 14627.66,6765.84 r0 top
D5 "MM3Z3V3B" SOD323F 13357,5310.5 r90 top
D6 "SMBJ70A/TR13" SMB_ 15119.82,3445 r180 top
D7 "SS510B" SMB_ 15208.98,3689.73 r90 top
D8 "SMAJ5.0CA" "SMA Bi Directional" 10685,6145 r270 top
D9 "1N4148W-7-F" SOD-123 11466.57,3374 r180 top value=2pF
D10 "1N4148W-7-F" SOD-123 10401.57,3374 r180 top value=2pF
D11 "SK104C" SMC 13750.51,3860 r0 top
D12 "MM3Z3V3B" SOD323F 11044,5936.34 r270 top
D17 "LESD8D3.3CAT5G" "SOD-882 Bi Directional" 10071.78,6048.57 r0 top
D18 "LESD8D3.3CAT5G" "SOD-882 Bi Directional" 10071.78,5947.57 r0 top
D19 "LESD8D3.3CAT5G" "SOD-882 Bi Directional" 10071.78,5847.57 r0 top
D20 "LESD8D3.3CAT5G" "SOD-882 Bi Directional" 14369.34,5239.93 r90 top
D21 "LESD8D3.3CAT5G" "SOD-882 Bi Directional" 14369.34,5310.8 r270 top
D22 "LESD8D3.3CAT5G" "SOD-882 Bi Directional" 14369.34,5397.41 r270 top
D23 "LESD8D3.3CAT5G" "SOD-882 Bi Directional" 14369.34,5486.59 r270 top
D24 "LESD8D3.3CAT5G" "SOD-882 Bi Directional" 14928.78,5653 r180 top
D25 "LESD8D3.3CAT5G" "SOD-882 Bi Directional" 10071.78,5747.57 r0 top
D26 "LESD8D3.3CAT5G" "SOD-882 Bi Directional" 10071.78,5648.02 r0 top
D27 "LESD8D3.3CAT5G" "SOD-882 Bi Directional" 10071.78,5549.6 r0 top
D32 "LESD8D3.3CAT5G" "SOD-882 Bi Directional" 10071.78,5451.17 r0 top
D71 "MMSZ5242BS-7-F" SOD-323 14867.02,3520.31 r270 top
J1 "20021121-00010C4LF" 20021121-00010C4LF_ 14250,6923.23 r180 top
J2 "DB135-10.16-2P-GN-P" DB135-10.16-2P-GN-P 14293,2978.33 r180 top
J3 "TB008A-508-02BE" TB008A-508-02BE 11461.57,2924 r0 top
J4 "TB008A-508-02BE" TB008A-508-02BE 10394.57,2924 r0 top
J5 "0022112032" 0022112032 12000,5825 r180 top
J6 "TB008A-508-02BE" TB008A-508-02BE 11525,6835 r180 top
J7 "10118194-0001LF" 10118194-0001LF_ 14678.82,6888.43 r180 top
J8 "TB008A-508-04BE" TB008A-508-04BE 11040,6835 r180 top
J10 "0022112022" 0022112022 12298,5826.49 r180 top
J13 "HC-1.25-12PLT" HC-1.25-12PLT 9843.29,4704.57 r270 top
J14 "1.27-1*2P" "HDR 1x2 Male 1.27mm" 15238.92,4348.92 r90 top
J16 "1.27-1*2P" "HDR 1x2 Male 1.27mm" 15238.92,4235.77 r90 top
J18 "TB008A-508-03BE" TB008A-508-03BE 12384,6835 r180 top
J19 "HC-1.25-12PLT" HC-1.25-12PLT 9842.56,5574.57 r270 top
J30 "DM3BT-DSF-PEJS" DM3BT-DSF-PEJS 14757.34,5322.61 r90 top
L1 "10uH" Ind-0805 12971.42,5758.49 r270 top
L2 "220uH" SLF12575T-221M1R3-PF 12846,3032 r90 top
L3 "4.7uH" YPRH0704-4R7M 14591.98,4714.24 r0 top
L7 "470nH" "Inductor 1008" 12361.49,4174.93 r0 top
LED1 "Red" LED-0402 13816.5,5316.3 r270 top
LED2 "Red" LED-0402 13657.5,5316.3 r270 top
LED3 "Red" LED-0402 13549,5317 r270 top
LED4 "ALS-PT19-315C/L177/TR8" ALS-PT19-315C/L177/TR_ 13206,6918.93 r90 top
LED11 "RED" LED-0603 12057.53,4897 r180 top
LS1 "YS-SBZ9032C03R16" YS-SBZ9032C03R16_ 13659.58,6805.61 r0 top
NT1 "Net Tie_SMD" "Net Tie Pad" 11835.5,4647 r0 top net-tie
P1 "TEST POINT 0.5mm Dia" "Test-point - 0.5mm" 12481,3680 r180 top
P7 "TEST POINT 0.5mm Dia" "Test-point - 0.5mm" 13225,3425 r180 top
P9 "TEST POINT 0.5mm Dia" "Test-point - 0.5mm" 13164,4836 r180 top
P10 "TEST POINT 0.5mm Dia" "Test-point - 0.5mm" 12481,3485 r270 top
P11 "TEST POINT 0.5mm Dia" "Test-point - 0.5mm" 13980,4985 r180 top
P16 "TEST POINT 0.5mm Dia" "Test-point - 0.5mm" 14717.97,4907 r270 top
Q2 "MMBT5551" SOT-23 13967.58,6766.24 r0 top
Q3 "MMBT5551" SOT-23 10823.32,6082.6 r270 top
Q4 "DMN13H750S-7" SOT-23 12248,5613.63 r0 top
Q5 "IRF3205STRLPBF" D2Pak. 11963.57,3193.04 r180 top
Q6 "IRF3205STRLPBF" D2Pak. 10887.57,3193.04 r180 top
Q7 "IRLML6402TRPBF" SOT-23 11425,6275.63 r0 top
Q8 "MMBT2222A-7-F" SOT-23 14286.9,3978.45 r180 top
Q9 "MMBT5551" SOT-23 11387.6,6120.63 r0 top
Q10 "BSC028N06NSATMA1" PG-TDSON-8-7 14722.95,3620 r90 top
Q26 "Si2302CDS" Sot-23 12290,6340 r180 top
Q32 "AO3407" SOT-23 14157.4,3825.78 r180 top
R1 "3.6K" Res-0603 13373.48,3141.84 r90 top
R2 "0.33R" Res-0603 13186,3285 r180 top value=0.33Ω
R3 "1.2K" Res-0603 13373.48,3035.55 r270 top
R4 "4.7K" Res-0603 13262,6918.93 r270 top
R5 "4.7K" Res-0603 11421.56,3782 r90 top
R6 "4.7K" Res-0603 13960.18,6669 r180 top
R7 "6.8K" Res-0603 11536.56,3782 r270 top value=6.8kR
R8 "4.7K" Res-0603 10389.56,3782 r90 top
R9 "20K" Res-0603 12680,6755 r90 top
R10 "6.8K" Res-0603 10508.56,3782 r270 top value=6.8kR
R11 "2.21M" RES-0603 14876.83,4321.92 r90 top
R12 "15K" Res-0603 13256,5333.3 r180 top value=15kR
R13 "3.3K" Res-0603 13424,5303.3 r90 top
R14 "680R" Res-0603 13767.53,5303.3 r90 top
R15 "680R" Res-0603 13706.5,5303.3 r90 top
R16 "4.7K" Res-0402 14879.27,6534 r0 top
R17 "680R" Res-0603 13598.69,5303.3 r90 top
R18 "4.7K" Res-0402 11350,6011.5 r90 top
R19 "10K" Res-0603 11455,6380 r180 top value=10kR
R20 "10K" Res-0603 10832.69,5968 r0 top value=10kR
R21 "150R" Res-0603 10980,6165 r90 top
R22 "2.2K" Res-0603 10785,6210 r270 top
R23 "10K" Res-0603 11044,6165 r90 top
R24 "47R" Res-0603 12204,3373.08 r90 top
R25 "47R" Res-0603 10987.57,3558 r270 top
R26 "2.2K" Res-0603 11105,6052.6 r270 top
R27 "7.5K" Res-0603 11165,6285 r90 top
R28 "3.3K" Res-0603 11220,6284.37 r90 top
R29 "10K" Res-0603 11165,6165 r270 top
R30 "20K" Res-0603 14820.92,4321.92 r270 top
R31 "4.7K" Res-0402 13924.52,5486.09 r180 top
R32 "100K" RES-0805 15079.46,3598.59 r270 top
R33 "2.2K" Res-0603 11165,6052.6 r270 top
R34 "1K" Res-0603 14269.4,3835.15 r270 top
R35 "10K" Res-0603 10640,6345 r90 top value=10kR
R43 "10K" Res-0603 10783.95,6345 r90 top value=10kR
R44 "10K" Res-0603 12152,5490 r270 top
R46 "200K" Res-0603 11139,4278 r270 top
R47 "200K" Res-0603 10801,4242.18 r270 top
R48 "1K" Res-0603 11113,3952 r90 top
R55 "0R" Res-0402 13163.5,6235.21 r0 top
R62 "100K" Res-0201 13093.92,4525.6 r0 top
R63 "47K" Res-0402 13026.52,4507.1 r90 top
R64 "1K" Res-1206 15079.46,3915 r90 top
R65 "63.4K" Res-0603 14820.92,4213.77 r90 top value=63.4kR
R66 "0R" Res-0603 15083.92,4343.6 r270 top
R67 "0R" Res-0603 15083.92,4235.77 r90 top
R68 "1K" Res-0603 14157.4,3939.08 r180 top
R69 "470R" Res-0603 14286.9,4075 r180 top
R70 "10K" Res-0603 14157.4,3999.71 r180 top
R73 "10K" Res-0402 12290,6427.5 r180 top
R74 "10K" Res-0402 12130,6319.13 r270 top
R75 "1K" Res-0603 12185,6330 r90 top
R97 "0R" Res-0603 10058.56,5998.23 r180 top
R98 "0R" Res-0603 10058.56,5897.69 r180 top
R99 "0R" Res-0603 10058.56,5798.14 r180 top
R100 "0R" Res-0603 10058.56,5697.6 r180 top
R101 "0R" Res-0603 10058.56,5599.05 r180 top
R102 "0R" Res-0603 10058.56,5500.51 r180 top
R103 "0R" Res-0603 10058.56,5401.96 r180 top
R104 "0R" Res-0402 14224,6077.58 r180 top
R105 "10K" Res-0402 13298.24,6525.5 r90 top
R109 "1.82M" Res-0603 12647.49,4503.01 r90 top value=1.82MR
R124 "100R" Res-0603 12210.34,5489.09 r90 top
R125 "10K" Res-0603 13841.25,4673.5 r180 top value=10kR
R126 "3.3k" Res-0603 13841.25,4727 r0 top
R127 "10K" Res-0603 10026,4163.19 r270 top value=10kR
R128 "3.3k" Res-0603 9970.5,4163.19 r90 top
R129 "DNP" Res-0603 13841.25,4834 r0 top
R130 "0R" Res-0603 13841.25,4620 r0 top
R131 "470R" Res-0603 12745,4272.49 r90 top
R132 "470R" Res-0603 12391,4871 r270 top
R133 "DNP" Res-0603 13841.25,4780.5 r180 top value=10kR
R134 "DNP" Res-0603 10137,4163.19 r90 top
R135 "0R" Res-0603 10081.5,4163.19 r90 top
R136 "1.82M" Res-0603 12587.99,4272.49 r270 top value=1.82MR
R137 "DNP" Res-0603 9915,4163.19 r270 top value=10kR
R149 "0R" Res-2512 14327.95,3630 r180 top
R156 "10K" Res-0201 14326.8,5242.88 r270 top
R157 "10K" Res-0201 14325.11,5307.84 r90 top
R158 "10K" Res-0201 14325.11,5394.46 r90 top
R159 "10K" Res-0201 14326.8,5483.63 r90 top
R160 "10K" Res-0201 14838.83,5653 r180 top
R161 "1M" Res-0603 12164.49,4332.01 r180 top
R162 "1M" Res-0603 12081.49,4304.01 r90 top
R163 "20K" Res-0603 12164.49,4274.93 r180 top
R164 "402K" Res-0603 12617.99,4357.12 r180 top
R165 "845K" Res-0603 12587.99,4503.01 r270 top
R166 "499K" Res-0603 12647.49,4272.49 r90 top
R167 "33K" Res-0603 12528.49,4503.01 r270 top value=33kR
SB1 "Solder Bridge 0603" "Solder Bridge" 13321,6918.93 r90 top
SB2 "Solder Bridge 0603" "Solder Bridge" 10980,6285 r270 top
SB3 "Solder Bridge 0603" "Solder Bridge" 10840,6345 r270 top
SB4 "Solder Bridge 0603" "Solder Bridge" 11105,5925 r90 top
SB5 "Solder Bridge 0603" "Solder Bridge" 10896.81,6345 r270 top
SB6 "Solder Bridge 0603" "Solder Bridge" 11078.94,6315.12 r0 top
SB7 "Solder Bridge 0603" "Solder Bridge" 15079.46,3730.64 r90 top
SB8 "Solder Bridge 0603" "Solder Bridge" 10440,6345 r270 top
SB9 "Solder Bridge 0603" "Solder Bridge" 14286.9,4162.77 r0 top
SB10 "Solder Bridge 0603" "Solder Bridge" 10373.91,6345 r270 top
SB11 "Solder Bridge 0603" "Solder Bridge" 14044,3835.78 r90 top
SB12 "Solder Bridge_1206" "SOLDER BRIDGE-1206_" 14560,3715 r90 top
SB13 "Solder Bridge 0603" "Solder Bridge" 11165,5925 r90 top
SW3 "TL3300CF160Q" TL3300CF160Q. 14804.12,5956.43 r0 top
SW4 "" SS-12D02-G040 14897.77,6364.45 r0 top
U1 "ACS723LLCTR-20AU-T" SOP-8 11446.56,3580.27 r90 top
U2 "ACS723LLCTR-20AU-T" SOP-8 10414.56,3580.27 r90 top
U3 "MC34063ADR" SOIC-8 13231,3086.84 r90 top
U4 "LMS8117AMP-3.3/NOPB" "SOT- 223" 12873,3628.08 r0 top
U5 "MAX38889AATE+" "16-QFN (3x3)." 12361.49,4332.01 r0 top
U6 "NCP81071ADR2G" SOIC-8 10970,3952 r270 top
U7 "LTC4359CMS8#PBF" MSOP-8 14972.95,3648 r90 top
U8 "SN74LV1T34DBVR" SOT-23-5 11037.46,4251.17 r270 top
U10 "SN74LV1T34DBVR" SOT-23-5 10903.4,4251.18 r270 top
U11 "SN74LV1T34DBVR" SOT-23-5 11243,3952 r180 top
U13 "TPS3700DDCR" SOT-23-6 14981.14,4290.34 r270 top
U14 "MIC29302WU-TR" "TO-263-5 (D2PAK)" 13230,4215.58 r180 top
U17 "AS312" AS312 12900.4,6938.35 r180 top
U19 "TPS2117DRLR" SOT-583 14003.25,4713.46 r0 top
U20 "LD56100DPU33R" DFN-8(1.2x1.6) 14065.68,4881.96 r270 top
U21 "STM32H723ZGT6" LQFP-144(20x20) 13688,5989 r0 top
U22 "TPS2117DRLR" SOT-583 9995.86,4325.05 r90 top
U30 "AP63205WU-7" TSOT-23-6 14466,4474.24 r90 top
X1 "25MHz" Q22FA12800090 13021.27,5871.91 r90 top
X3 "32.7680KHZ" NX3215SA-32.768K-STD-MUA-8_ 13048,6186 r90 top

## Footprints (in the part's own frame and the unit in brackets; to place one, negate y for a bottom-side part, rotate by r counter-clockwise, add the part's x,y. Pads: shape width x height; smd on the part's side, far side on the other; paste and mask are expansions set on the pad)
"16-QFN (3x3)." [mm]
  rect 0.7x0.25 smd: 1(-1.45,0.75) 2(-1.45,0.25) 3(-1.45,-0.25) 4(-1.45,-0.75) 9(1.45,-0.75) 10(1.45,-0.25) 11(1.45,0.25) 12(1.45,0.75)
  rect 0.25x0.7 smd: 5(-0.75,-1.45) 6(-0.25,-1.45) 7(0.25,-1.45) 8(0.75,-1.45) 13(0.75,1.45) 14(0.25,1.45) 15(-0.25,1.45) 16(-0.75,1.45)
  rect 1.7x1.7 smd: 17(0,0)
  silkscreen extent -2.08,-1.6 1.6,1.6, body extent -1.55,-1.55 1.55,1.55, height 0.99
10118194-0001LF_ [mm]
  rect 0.42x1.35 smd: 1(-1.3,0) 2(-0.65,0) 3(0,0) 4(0.65,0) 5(1.3,0)
  rect 1.5x1.55 smd: MP1(-1,-2.7) MP2(1,-2.7)
  oval 1.25x1 hole 0.55 slot 0.85 at 0 deg: S1(-2.5,0) S2(2.5,0)
  oval 0.8x1.55 hole 0.5 slot 1.15 at 90 deg: S3(3.5,-2.7) S4(-3.5,-2.7)
  Top Layer region: 193 vertices and 0 holes, not listed, extent 2.3,-3.48 4,-1.925
  Top Layer region: 193 vertices and 0 holes, not listed, extent -4,-3.475 -2.3,-1.92
  silkscreen extent -3.51,-4.72 3.51,0.71, body extent -4.02,-5.34 4.03,0.19, height 2.69
20021121-00010C4LF_ [mm]
  rect 0.76x2.4 smd: 1(-2.54,-1.95) 2(-2.54,1.95) 3(-1.27,-1.95) 4(-1.27,1.95) 5(0,-1.95) 6(0,1.95) 7(1.27,-1.95) 8(1.27,1.95) 9(2.54,-1.95) 10(2.54,1.95)
  silkscreen extent -3.43,-2.08 3.23,1.22, body extent -3.17,-2.78 3.18,2.72, height 4.5
0022112022 [mm]
  rect 2x2 hole 1.2 paste-2539.97 mask+0.051: 1(-1.27,0)
  round 2 hole 1.2 paste-2539.97 mask+0.051: 2(1.27,0)
  silkscreen extent -2.5,-3.18 2.5,3.18, body extent -2.46,-3.18 2.46,3.17, height 10.73
0022112032 [mm]
  rect 2x2 hole 1.2 paste-2539.97 mask+0.051: 1(-2.54,0)
  round 2 hole 1.2 paste-2539.97 mask+0.051: 2(0,0) 3(2.54,0)
  silkscreen extent -3.77,-3.18 3.77,3.18, body extent -3.73,-3.25 3.73,3.1, height 10.68
ALS-PT19-315C/L177/TR_ [mm]
  rect 0.82x0.82 smd: 1(-0.75,0) 2(0.75,0)
  silkscreen extent -1.57,-0.51 1.27,0.51, body extent -0.85,-0.4 0.85,0.4, height 0.6
AS312 [mil]
  round 60 hole 36 paste-99999 mask+2: 1(-100.4,48.95) 2(2.6,-48.95) 3(100.4,48.35)
  silkscreen extent -156,-112 152,195, body extent -179,-130 179,228, height 177
Cap-0201 [mm]
  rect 0.3x0.3 smd mask+0.055: 1(-0.3,0) 2(0.3,0)
  silkscreen extent -0.53,-0.23 0.53,0.23, body extent -0.3,-0.15 0.3,0.15, height 0.28
CAP-0201 [mm]
  rect 0.3x0.3 smd mask+0.055: 1(-0.3,0) 2(0.3,0)
  silkscreen extent -0.53,-0.23 0.53,0.23, body extent -0.3,-0.15 0.3,0.15, height 0.28
Cap-0402 [mil]
  rect 18x25 smd mask+2.36: 1(-18.5,0) 2(18.5,0)
  silkscreen extent -31,-16 31,16, body extent -20,-10 20,10, height 19
Cap-0603 [mil]
  rect 30x35 smd mask+2.36: 1(-30,0) 2(30,0)
  silkscreen extent -49,-21 49,21, body extent -32,-16 31,16, height 34
Cap-0805 [mil] "SMD 0805"
  rect 40x60 smd mask+2.76: 1(-40,0) 2(40,0)
  silkscreen extent -64,-34 64,34, body extent -39,-25 39,25, height 30
Cap-1206 [mil] "SMD 1206"
  rect 60x70 smd: 1(-50,0) 2(50,0)
  silkscreen extent -84,-39 84,39, body extent -63,-31 63,32, height 39
Case-B [mm]
  rect 1.7x3 smd paste+0: 1(-1.7,0) 2(1.7,0)
  silkscreen extent -3.35,-1.63 2.03,1.63, body extent -1.85,-1.5 1.85,1.5, height 2.16
Case-E [mm]
  rect 2.79x2.57 smd: 1(0,0) 2(6.44,0)
  silkscreen extent -1.56,-2.31 7.03,2.31, body extent -0.27,-2.21 6.92,2.21, height 2.88
D2Pak. [mm]
  rect 2.08x3.81 smd: 1(-2.54,-5.335) 2(2.54,-5.335)
  rect 11.43x8.89 smd: 3(0,5.335)
  silkscreen extent -5.21,-5.46 5.11,0.51, body extent -5.08,-6.6 5.02,8.79, height 4.5
DB135-10.16-2P-GN-P [mm]
  round 3.6 hole 2.4 paste-2539.97 mask+0.051: 1(-5.08,5.08) 1(-5.08,-5.08) 2(5.08,5.08) 2(5.08,-5.08)
  silkscreen extent -10.89,-11.32 10.16,7.38, body extent -10.91,-11.3 10.16,7.4, height 29.5
DFN-8(1.2x1.6) [mm]
  rect 0.345x0.2 smd paste+0 mask+0.051: 1(-0.547,0.6) 2(-0.547,0.2) 3(-0.547,-0.2) 4(-0.547,-0.6) 5(0.547,-0.6) 6(0.547,-0.2) 7(0.547,0.2) 8(0.547,0.6)
  rect 0.3x1.3 smd paste+0 mask+0.051: 9(0,0)
  silkscreen extent -0.98,-0.88 0.68,0.88, body extent -0.61,-0.81 0.61,0.81, height 0.4
DM3BT-DSF-PEJS [mm]
  rect 0.7x1.4 smd: 1(-2.85,7.45) 2(-1.75,7.45) 3(-0.65,7.45) 4(0.45,7.45) 5(1.55,7.45) 6(2.65,7.45) 7(3.75,7.45) 8(4.85,7.45)
  rect 1x1.4 smd: S1(-4.75,7.45)
  rect 1.2x1.2 smd: S2(6.65,3.25)
  rect 1.2x3.2 smd: S3(6.65,-6.55)
  rect 1.5x1.9 smd paste-2 mask+0: S4(-6.65,-7.55)
  rect 1.2x0.8 smd: SW-A(6.65,-2.95)
  rect 0.7x1.2 smd: SW-B(5.8,7.55)
  Top Layer region: -5.9,-7.85 -5.75,-8 -5.4,-8 -5.4,-8.5 -7.4,-8.5 -7.4,-6.6 -5.9,-6.6
  Keep-Out Layer region: 7.15,3.85 6.4,3.85 6.4,7.1 7.15,7.1
  Keep-Out Layer region: 7.15,-0.95 6.4,-0.95 6.4,2.65 7.15,2.65
  silkscreen extent -7,-8.58 6.85,8.46, body extent -6.96,-9.93 6.89,7.62, height 1.8
EEE-FT1E471GP_ [mm]
  rect 4x2.5 smd: 1(-3.35,0) 2(3.35,0)
  silkscreen extent -5,-4.22 4.22,4.22, body extent -4.65,-4.15 4.65,4.15, height 10.54
HC-1.25-12PLT [mm]
  rect 0.8x1.62 smd paste+0 mask+0.05: 1(-6.875,1.38) 2(-5.625,1.38) 3(-4.375,1.38) 4(-3.125,1.38) 5(-1.875,1.38) 6(-0.625,1.38) 7(0.625,1.38) 8(1.875,1.38) 9(3.125,1.38) 10(4.375,1.38) 11(5.625,1.38) 12(6.875,1.38)
  rect 2.35x2.5 smd paste+0 mask+0.05: MP1(-9.2,-1.38) MP2(9.2,-1.38)
  silkscreen extent -9.91,-2.42 9.91,1.66, body extent -9.97,-2.38 9.97,1.52, height 4.75
"HDR 1x2 Male 1.27mm" [mm]
  rect 1x1 hole 0.75 paste-2539.97 mask+0.051: 1(-0.635,0)
  round 1 hole 0.75 paste-2539.97 mask+0.051: 2(0.635,0)
  silkscreen extent -1.27,-1.18 1.27,1.18, body extent -1.27,-1.17 1.28,1.17, height 5.6
Ind-0805 [mm] "Inductor 0805"
  rect 1.2x1.32 smd: 1(-1,0) 2(1,0)
  silkscreen extent -0.25,-0.69 0.25,0.69, body extent -1,-0.62 1,0.63, height 0.47
"Inductor 1008" [mm]
  rect 0.85x2 smd: 1(-0.825,0) 2(0.825,0)
  silkscreen extent -0.23,-1.07 0.23,1.07, body extent -1.25,-1.07 1.25,1.03, height 1.31
LED-0402 [mm]
  rect 0.62x0.72 smd: 1(-0.475,0) 2(0.475,0)
  silkscreen extent -0.89,-0.51 1.55,0.51, body extent -0.5,-0.25 0.51,0.25, height 0.45
LED-0603 [mm]
  rect 0.5x1 smd: 1(-0.75,0) 2(0.75,0)
  silkscreen extent -1.12,-0.66 1.75,0.66, body extent -0.82,-0.37 0.82,0.36, height 0.68
LQFP-144(20x20) [mm]
  rect 1.56x0.28 smd: 1(-10.68,8.75) 2(-10.68,8.25) 3(-10.68,7.75) 4(-10.68,7.25) 5(-10.68,6.75) 6(-10.68,6.25) 7(-10.68,5.75) 8(-10.68,5.25) 9(-10.68,4.75) 10(-10.68,4.25) 11(-10.68,3.75) 12(-10.68,3.25) 13(-10.68,2.75) 14(-10.68,2.25) 15(-10.68,1.75) 16(-10.68,1.25) 17(-10.68,0.75) 18(-10.68,0.25) 19(-10.68,-0.25) 20(-10.68,-0.75) 21(-10.68,-1.25) 22(-10.68,-1.75) 23(-10.68,-2.25) 24(-10.68,-2.75) 25(-10.68,-3.25) 26(-10.68,-3.75) 27(-10.68,-4.25) 28(-10.68,-4.75) 29(-10.68,-5.25) 30(-10.68,-5.75) 31(-10.68,-6.25) 32(-10.68,-6.75) 33(-10.68,-7.25) 34(-10.68,-7.75) 35(-10.68,-8.25) 36(-10.68,-8.75) 73(10.68,-8.75) 74(10.68,-8.25) 75(10.68,-7.75) 76(10.68,-7.25) 77(10.68,-6.75) 78(10.68,-6.25) 79(10.68,-5.75) 80(10.68,-5.25) 81(10.68,-4.75) 82(10.68,-4.25) 83(10.68,-3.75) 84(10.68,-3.25) 85(10.68,-2.75) 86(10.68,-2.25) 87(10.68,-1.75) 88(10.68,-1.25) 89(10.68,-0.75) 90(10.68,-0.25) 91(10.68,0.25) 92(10.68,0.75) 93(10.68,1.25) 94(10.68,1.75) 95(10.68,2.25) 96(10.68,2.75) 97(10.68,3.25) 98(10.68,3.75) 99(10.68,4.25) 100(10.68,4.75) 101(10.68,5.25) 102(10.68,5.75) 103(10.68,6.25) 104(10.68,6.75) 105(10.68,7.25) 106(10.68,7.75) 107(10.68,8.25) 108(10.68,8.75)
  rect 0.28x1.56 smd: 37(-8.75,-10.68) 38(-8.25,-10.68) 39(-7.75,-10.68) 40(-7.25,-10.68) 41(-6.75,-10.68) 42(-6.25,-10.68) 43(-5.75,-10.68) 44(-5.25,-10.68) 45(-4.75,-10.68) 46(-4.25,-10.68) 47(-3.75,-10.68) 48(-3.25,-10.68) 49(-2.75,-10.68) 50(-2.25,-10.68) 51(-1.75,-10.68) 52(-1.25,-10.68) 53(-0.75,-10.68) 54(-0.25,-10.68) 55(0.25,-10.68) 56(0.75,-10.68) 57(1.25,-10.68) 58(1.75,-10.68) 59(2.25,-10.68) 60(2.75,-10.68) 61(3.25,-10.68) 62(3.75,-10.68) 63(4.25,-10.68) 64(4.75,-10.68) 65(5.25,-10.68) 66(5.75,-10.68) 67(6.25,-10.68) 68(6.75,-10.68) 69(7.25,-10.68) 70(7.75,-10.68) 71(8.25,-10.68) 72(8.75,-10.68) 109(8.75,10.68) 110(8.25,10.68) 111(7.75,10.68) 112(7.25,10.68) 113(6.75,10.68) 114(6.25,10.68) 115(5.75,10.68) 116(5.25,10.68) 117(4.75,10.68) 118(4.25,10.68) 119(3.75,10.68) 120(3.25,10.68) 121(2.75,10.68) 122(2.25,10.68) 123(1.75,10.68) 124(1.25,10.68) 125(0.75,10.68) 126(0.25,10.68) 127(-0.25,10.68) 128(-0.75,10.68) 129(-1.25,10.68) 130(-1.75,10.68) 131(-2.25,10.68) 132(-2.75,10.68) 133(-3.25,10.68) 134(-3.75,10.68) 135(-4.25,10.68) 136(-4.75,10.68) 137(-5.25,10.68) 138(-5.75,10.68) 139(-6.25,10.68) 140(-6.75,10.68) 141(-7.25,10.68) 142(-7.75,10.68) 143(-8.25,10.68) 144(-8.75,10.68)
  silkscreen extent -11.81,-10.03 10.03,10.03, body extent -11,-11 11,11, height 1.61
MSOP-8 [mm]
  rect 1.42x0.4 smd: 1(-1.77,0.975) 2(-1.77,0.325) 3(-1.77,-0.325) 4(-1.77,-0.975) 5(1.77,-0.975) 6(1.77,-0.325) 7(1.77,0.325) 8(1.77,0.975)
  silkscreen extent -2.8,-1.49 1.4,1.49, body extent -2,-1.48 2,1.47, height 1.3
"Net Tie Pad" [mil]
  rect 18x25 smd mask-10: 1(-18.5,0) 2(18.5,0)
  Top Layer region: -15,-40.12 15,-40.12 15,37.37 -15,37.37
NX3215SA-32.768K-STD-MUA-8_ [mm]
  rect 1x1.8 smd: 1(-1.25,0) 2(1.25,0)
  silkscreen extent -0.51,-0.79 0.51,0.79, body extent -1.6,-0.75 1.6,0.75, height 0.8
PG-TDSON-8-7 [mm]
  rect 0.925x0.5 smd paste-1: 1(-1.433,1.905) 2(-1.433,0.635) 3(-1.433,-0.635) 4(-1.433,-1.905)
  rect 0.8x0.6 smd paste-1: 5(4.33,-1.905) 6(4.33,-0.635) 7(4.33,0.635) 8(4.33,1.905)
  Top Layer region: 4.758,1.605 3.958,1.605 3.958,0.935 4.758,0.935 4.758,0.335 3.958,0.335 3.958,-0.335 4.758,-0.335 4.758,-0.935 3.958,-0.935 3.958,-1.605 4.758,-1.605 4.758,-2.205 0.302,-2.205 0.302,2.205 4.758,2.205
  silkscreen extent -2.18,-2.52 4.4,2.52, body extent -1.6,-2.53 4.4,2.47, height 1.05
Q22FA12800090 [mm]
  rect 0.95x0.85 smd: 1(0,-1.15) 2(1.45,-1.15) 3(1.45,0) 4(0,0)
  silkscreen extent -0.7,-1.41 0.78,0.29, body extent -0.3,-1.36 1.7,0.24, height 0.65
Res-0201 [mm]
  rect 0.27x0.37 smd mask+0.055: 1(-0.275,0) 2(0.275,0)
  silkscreen extent -0.48,-0.25 0.48,0.25, body extent -0.3,-0.15 0.3,0.15, height 0.29
Res-0402 [mil]
  rect 18x25 smd mask+2.17: 1(-18.5,0) 2(18.5,0)
  silkscreen extent -32,-17 32,16, body extent -23,-11 23,11, height 16
Res-0603 [mil]
  rect 30x35 smd: 1(-30,0) 2(30,0)
  silkscreen extent -48,-21 48,21, body extent -31,-17 31,17, height 18
RES-0603 [mil]
  rect 30x35 smd: 1(-30,0) 2(30,0)
  silkscreen extent -48,-21 48,21, body extent -31,-17 31,17, height 18
RES-0805 [mil] "SMD 0805"
  rect 40x50 smd: 1(-40,0) 2(40,0)
  silkscreen extent -64,-29 64,29, body extent -39,-25 39,24, height 24
Res-1206 [mil]
  rect 60x70 smd: 1(-50,0) 2(50,0)
  silkscreen extent -84,-39 84,39, body extent -63,-31 63,31, height 24
Res-2512 [mm]
  rect 1.6x3.4 smd: 1(-3.25,0) 2(3.25,0)
  silkscreen extent -4.24,-1.85 4.24,1.85, body extent -3.17,-1.63 3.18,1.63, height 0.58
RVT1E100M0405_ [mm] "10uF 25V 5.4mm SMD"
  rect 2.6x1.6 smd: 1(-1.8,0) 2(1.8,0)
  silkscreen extent -3.1,-2.22 2.16,2.22, body extent -2.65,-2.15 2.65,2.15, height 5.7
SCCU25B256SRB [mm]
  rect 1.8x1.8 hole 0.92: 1(-3.66,0)
  round 1.8 hole 0.92: 2(3.66,0)
  silkscreen extent -8,-8 8,8, body extent -8,-8 8,8, height 25.05
SLF12575T-221M1R3-PF [mm] "0.492\" L x 0.492\" W (12.50mm x 12.50mm)"
  rect 2.6x3.2 smd: 1(-5.55,0) 2(5.55,0)
  silkscreen extent -6.35,-6.32 6.35,6.32, body extent -6.27,-6.33 6.33,6.27, height 7.5
SMA [mm]
  rect 2.5x1.7 smd: 1(-2,0) 2(2,0)
  silkscreen extent -4.45,-1.42 2.06,1.42, body extent -2.6,-1.3 2.6,1.3, height 2.4
"SMA Bi Directional" [mm]
  rect 2x1.8 smd paste+0 mask+0.051: 1(-2,0) 2(2,0)
  silkscreen extent -2.3,-1.4 2.3,1.4, body extent -2.6,-1.3 2.6,1.3, height 2.4
SMB_ [mm]
  rect 2.8x2.4 smd: 1(-2.3,0) 2(2.3,0)
  silkscreen extent -2.21,-1.91 4.83,1.9, body extent -2.7,-1.8 2.7,1.8, height 2.3
SMC [mm]
  rect 4.1x4.3 smd: 1(-3.95,0) 2(3.95,0)
  silkscreen extent -7.24,-3.05 3.58,3.05, body extent -3.9,-2.95 3.9,2.95, height 2.41
SOD323F [mm]
  rect 0.6x0.6 smd: 1(-1.05,0) 2(1.05,0)
  silkscreen extent -0.91,-0.79 2.11,0.79, body extent -1.25,-0.68 1.25,0.68, height 1
SOD-123 [mm]
  rect 0.95x0.9 smd: 1(-1.575,0) 2(1.575,0)
  silkscreen extent -1.37,-0.8 2.82,0.8, body extent -1.82,-0.78 1.83,0.78, height 1.5
SOD-323 [mm]
  rect 0.8x0.9 smd mask+0.055: 1(-1.15,0) 2(1.15,0)
  silkscreen extent -2.01,-0.79 0.94,0.79, body extent -1.3,-0.67 1.3,0.67, height 1.1
"SOD-882 Bi Directional" [mm]
  rect 0.5x0.8 smd mask+0.055: 1(-0.35,0) 2(0.35,0)
  silkscreen extent -0.69,-0.48 0.69,0.48, body extent -0.49,-0.29 0.49,0.29, height 0.48
SOIC-8 [mm]
  rect 1.55x0.6 smd: 1(-2.7,1.905) 2(-2.7,0.635) 3(-2.7,-0.635) 4(-2.7,-1.905) 5(2.7,-1.905) 6(2.7,-0.635) 7(2.7,0.635) 8(2.7,1.905)
  silkscreen extent -3.76,-2.49 1.99,2.49, body extent -3,-2.45 3,2.45, height 1.7
"Solder Bridge" [mil] "Solder Bridge ON"
  rect 30x35 smd: 1(-30,0) 2(30,0)
  silkscreen extent -50,-22 50,22
"SOLDER BRIDGE-1206_" [mil]
  rect 60x70 smd: 1(-50,0) 2(50,0)
  silkscreen extent -85,-40 85,40
SOP-8 [mm]
  rect 1.3x0.7 smd: 1(-2.75,1.905) 2(-2.75,0.635) 3(-2.75,-0.635) 4(-2.75,-1.905) 5(2.75,-1.905) 6(2.75,-0.635) 7(2.75,0.635) 8(2.75,1.905)
  silkscreen extent -3.69,-2.57 2.03,2.57, body extent -3.1,-2.5 3.1,2.5, height 1.76
Sot-23 [mm] "TRANS NPN 40V 0.6A SOT23"
  rect 0.82x0.92 smd: 1(-0.95,-1) 2(0.95,-1) 3(0,1)
  silkscreen extent -1.68,-1.3 1.55,0.81, body extent -1.5,-1.25 1.5,1.25, height 1.05
SOT-23 [mm] "TRANS NPN 40V 0.6A SOT23"
  rect 0.82x0.92 smd: 1(-0.95,-1) 2(0.95,-1) 3(0,1)
  silkscreen extent -1.68,-1.3 1.55,0.81, body extent -1.5,-1.25 1.5,1.25, height 1.05
SOT-23-5 [mm]
  rect 1.1x0.6 smd: 1(-1.3,0.95) 2(-1.3,0) 3(-1.3,-0.95) 4(1.3,-0.95) 5(1.3,0.95)
  silkscreen extent -2.13,-1.5 0.88,1.5, body extent -1.4,-1.45 1.4,1.45, height 1.45
SOT-23-6 [mm]
  rect 1.22x0.62 smd: 1(-1.31,0.95) 2(-1.31,0) 3(-1.31,-0.95) 4(1.31,-0.95) 5(1.31,0) 6(1.31,0.95)
  silkscreen extent -2.18,-1.52 0.86,1.52, body extent -1.5,-1.5 1.5,1.5, height 1.47
SOT-583 [mm]
  rect 0.67x0.32 smd mask+0.055: 1(-0.735,0.75) 2(-0.735,0.25) 3(-0.735,-0.25) 4(-0.735,-0.75) 5(0.735,-0.75) 6(0.735,-0.25) 7(0.735,0.25) 8(0.735,0.75)
  silkscreen extent -1.32,-1.1 0.6,1.1, body extent -0.8,-1.05 0.8,1.05, height 0.6
"SOT- 223" [mm]
  rect 1.5x2 smd: 1(-2.3,-3.05) 2(0,-3.05) 3(2.3,-3.05)
  rect 3.8x2 smd: 4(0,3.05)
  silkscreen extent -3.35,-3.2 3.3,1.8, body extent -3.25,-3.5 3.25,3.5, height 1.61
SS-12D02-G040 [mm]
  rect 1.7x1.7 hole 1: 1(-2,0)
  round 1.7 hole 1: 2(0,0) 3(2,0)
  rect 1.5x2.2 hole 0.7 square: MH1(-4.1,0) MH2(4.1,0)
  silkscreen extent -4.32,-2.31 4.32,2.31, body extent -4.32,-2.25 4.28,2.25, height 9.47
TB008A-508-02BE [mm]
  rect 2.4x2.4 / inner round 2.4 / far side rect 2.4x2.4 hole 1.6: 1(-2.54,0)
  round 2.4 hole 1.6: 2(2.54,0)
  silkscreen extent -5.08,-6 5.08,7.89, body extent -5.58,-6.02 5.08,7.87, height 15.82
TB008A-508-03BE [mm]
  rect 2.4x2.4 / inner round 2.4 / far side rect 2.4x2.4 hole 1.6: 1(0,0)
  round 2.4 hole 1.6: 2(5.08,0) 3(10.16,0)
  silkscreen extent -2.54,-6 12.7,7.89, body extent -2.97,-6 12.77,7.89, height 15.82
TB008A-508-04BE [mm]
  rect 2.4x2.4 / inner round 2.4 / far side rect 2.4x2.4 hole 1.6: 1(0,0)
  round 2.4 hole 1.6: 2(5.08,0) 3(10.16,0) 4(15.24,0)
  silkscreen extent -2.54,-6 17.78,7.89, body extent -3.08,-6 17.74,7.89, height 15.82
"Test-point - 0.5mm" [mm]
  oct 1x1 smd: 1(0,0)
  silkscreen extent -0.68,-0.68 0.68,0.68
TL3300CF160Q. [mm] "SWITCH TACTILE SPST-NO 0.05A 12V"
  rect 2.5x1.8 smd: 1(-7.75,2.5) 2(7.75,2.5) 3(-7.75,-2.5) 4(7.75,-2.5)
  silkscreen extent -7.21,-6.07 6.15,6.12, body extent -7.5,-5.98 7.5,6.02, height 8.77
"TO-263-5 (D2PAK)" [mm]
  rect 1.02x4.32 smd: 1(-3.4,-4.572) 2(-1.7,-4.572) 3(0,-4.572) 4(1.7,-4.572) 5(3.4,-4.572)
  rect 11.18x9.91 smd: 6(0,4.573)
  silkscreen extent -5.16,-4.72 5.16,-0.61, body extent -5.11,-5.78 5.05,9.13, height 4.83
TSOT-23-6 [mm]
  rect 1x0.6 smd: 1(-1.2,0.95) 2(-1.2,0) 3(-1.2,-0.95) 4(1.2,-0.95) 5(1.2,0) 6(1.2,0.95)
  silkscreen extent -1.98,-1.5 0.86,1.5, body extent -1.41,-1.45 1.41,1.45, height 1
UWX1E101MCL1GB_ [mm]
  rect 5x2.8 smd: 1(-3.65,0) 2(3.65,0)
  silkscreen extent -5.21,-4.22 4.27,4.22, body extent -4.45,-4.15 4.45,4.15, height 5.4
YPRH0704-4R7M [mm]
  rect 1.6x2.2 smd: 1(-3.2,0) 2(3.2,0)
  silkscreen extent -3.65,-3.65 3.65,3.65, body extent -3.65,-3.65 3.65,3.65, height 4.5
YS-SBZ9032C03R16_ [mm] "NO 2700Hz 85dB @ 3V, 10cm 3V F9mm SMD,9x3.2mm Buzzers RoHS"
  rect 3x1.8 smd: 1(-4,0) 2(4,0)
  silkscreen extent -5.46,-4.5 6.06,6.54, body extent -5.25,-4.5 5.25,6.5, height 3.3

## Part data
C1 C4 C16 C21 C23 C24 C65 C68 C76: library part RVT1E100M0405, "CAP ALUM 10uF 25V SMD", LCSC Part Number=C970655, Manufacturer=ROQANG, Operating Temperature=-45℃~+105℃, Rated Voltage=25V, Tolerance=±20%, Capacitance=10uF, ComponentLink1Description=LCSC, ComponentLink1URL=https://www.lcsc.com/product-detail/Aluminum-Electrolytic-Capacitors-SMD_10uF-25V-20_C72484.html, Item Type=Capacitor, L=5.4mm, Manufacturer Part Number=RVT1E100M0405, φD=4mm
C2: library part CC1206KKX7R0BB104, "CAP CER 0.1UF 100V X7R 1206", Capacitance=100nF, Case Code (Imperial)=1206, Case Code (Metric)=3216, Dielectric=X7R, Dielectric Material=Ceramic, LCSC Part Number=C107181, Manufacturer=Yageo, Max Operating Temperature=125°C, Min Operating Temperature=-55°C, Package Quantity=1, Tolerance=10%, Voltage=63V, Voltage Rating=100V, Case/Package=1206, Category="Ceramic Capacitors", ComponentLink1Description=https://datasheet.ciiva.com/7978/1447671-7978227.pdf?src-supplier=Element14, ComponentLink1URL=https://datasheet.ciiva.com/7978/1447671-7978227.pdf?src-supplier=Element14, ComponentLink2Description=https://datasheet.ciiva.com/46391/1919308-46391993.pdf?src-supplier=Element14, ComponentLink2URL=https://datasheet.ciiva.com/46391/1919308-46391993.pdf?src-supplier=Element14, ComponentLink3Description=https://datasheet.ciiva.com/180/mlccorderingcode-180145.pdf?src-supplier=Digi-Key, ComponentLink3URL=https://datasheet.ciiva.com/180/mlccorderingcode-180145.pdf?src-supplier=Digi-Key, ComponentLink4Description=https://datasheet.ciiva.com/180/mlccorderingcode-180144.pdf?src-supplier=Digi-Key, ComponentLink4URL=https://datasheet.ciiva.com/180/mlccorderingcode-180144.pdf?src-supplier=Digi-Key, ComponentLink5Description=https://datasheet.ciiva.com/180/mlccorderingcode-180146.pdf?src-supplier=Digi-Key, ComponentLink5URL=https://datasheet.ciiva.com/180/mlccorderingcode-180146.pdf?src-supplier=Digi-Key, ComponentLink6Description=https://datasheet.ciiva.com/5425/upy-gp-np0-16v-to-50v-8-5425573.pdf?src-supplier=Mouser, ComponentLink6URL=https://datasheet.ciiva.com/5425/upy-gp-np0-16v-to-50v-8-5425573.pdf?src-supplier=Mouser, ComponentLink7Description=https://datasheet.ciiva.com/16981/upy-np0x7r-mv-100-to-630v-9-16981180.pdf?src-supplier=Future+Electronics, ComponentLink7URL=https://datasheet.ciiva.com/16981/upy-np0x7r-mv-100-to-630v-9-16981180.pdf?src-supplier=Future+Electronics, ComponentLink8Description=https://datasheet.ciiva.com/26829/getdatasheetpartid-403790-26829655.pdf?src-supplier=Verical, ComponentLink8URL=https://datasheet.ciiva.com/26829/getdatasheetpartid-403790-26829655.pdf?src-supplier=Verical, Depth=1.6mm, Height=1.25mm, Item Type=Capacitor, Lead Free="Lead Free", Length=3.2mm, Manufacturer Part Number=CC1206KKX7R0BB104, Mount="Surface Mount", Number of Pins=2, Packaging="Tape and Reel", Pricing 1="3000=0.01588, 6000=0.01565, 12000=0.01520, 18000=0.01486, 24000=0.01429, 30000=0.01395, 300000=0.01361 (USD)", Radiation Hardening=No, Reach SVHC Compliant=Yes, Resistor Type=Ceramic, RoHS=Yes, RoHS Compliant=Yes, Series=CC, Stock 1=24000, Supplier 1=Avnet, Supplier Part Number 1=CC1206KKX7R0BB104, Termination=SMD/SMT, Thickness=0.057inch, Voltage Rating (DC)=100V, Width=0.063inch
C3 C5 C8 C25 C37 C117: library part CC0603KRX5R8BB105, "CAP CER 1UF 25V X5R 0603", Case Code (Imperial)=0603, Case Code (Metric)=1608, Dielectric=X5R, LCSC Part Number=C14664, Manufacturer=Yageo, Max Operating Temperature=85°C, Min Operating Temperature=-55°C, Package Quantity=1, Supplier Part Number 1=311-1445-1-ND, Tolerance=10%, Voltage Rating=25V, Capacitance=1uF, Case/Package=0603, Category="Ceramic Capacitors", ComponentLink1Description=https://datasheet.ciiva.com/176/mlccorderingcode-176785.pdf?src-supplier=Digi-Key, ComponentLink1URL=https://datasheet.ciiva.com/176/mlccorderingcode-176785.pdf?src-supplier=Digi-Key, ComponentLink2Description=https://datasheet.ciiva.com/176/mlccorderingcode-176786.pdf?src-supplier=Digi-Key, ComponentLink2URL=https://datasheet.ciiva.com/176/mlccorderingcode-176786.pdf?src-supplier=Digi-Key, ComponentLink3Description=https://datasheet.ciiva.com/176/mlccorderingcode-176787.pdf?src-supplier=Digi-Key, ComponentLink3URL=https://datasheet.ciiva.com/176/mlccorderingcode-176787.pdf?src-supplier=Digi-Key, ComponentLink4Description=https://datasheet.ciiva.com/17436/upy-gphc-x5r-4v-to-50v-12-17436952.pdf?src-supplier=Avnet+Europe, ComponentLink4URL=https://datasheet.ciiva.com/17436/upy-gphc-x5r-4v-to-50v-12-17436952.pdf?src-supplier=Avnet+Europe, ComponentLink5Description=https://datasheet.ciiva.com/7978/1525783-7978171.pdf?src-supplier=Element14, ComponentLink5URL=https://datasheet.ciiva.com/7978/1525783-7978171.pdf?src-supplier=Element14, ComponentLink6Description=https://datasheet.ciiva.com/11586/upy-gphc-x5r-4v-to-50v-12-11586318.pdf?src-supplier=Avnet, ComponentLink6URL=https://datasheet.ciiva.com/11586/upy-gphc-x5r-4v-to-50v-12-11586318.pdf?src-supplier=Avnet, Construction=Flat, Depth=0.8mm, Halogen Free="Halogen Free", Height=0.8mm, Item Type=Capacitor, Lead Free="Lead Free", Length=1.6mm, Manufacturer Part Number=CC0603KRX5R8BB105, Mount="Surface Mount", Number of Pins=2, Packaging="Tape and Reel", Pricing 1="1=0.12000, 10=0.08400, 50=0.04760, 100=0.03940, 500=0.02764, 1000=0.02288 (USD)", Radiation Hardening=No, REACH SVHC="No SVHC", RoHS=Yes, RoHS Compliant=Yes, Series=CC, Stock 1=919939, Supplier 1=Digi-Key, Termination=SMD/SMT, Thickness=0.035inch, Voltage Rating (DC)=25V, Width=0.031inch
C6 C10 C13 C14 C17 C22 C26 C28 C38 C53 C66 C67 C69: library part CC0603ZRY5V9BB104, "CAP CER 0.1UF 50V Y5V 0603", Capacitance=100nF, Case Code (Imperial)=0603, Case Code (Metric)=1608, Dielectric=Y5V, LCSC Part Number=C106221, Manufacturer=Yageo, Max Operating Temperature=85°C, Min Operating Temperature=-30°C, Package Quantity=1, Supplier Part Number 1=311-1343-1-ND, Tolerance=80%, Voltage=50V, Case/Package=0603, ComponentLink1Description=http://www.yageo.com/documents/recent/UPY-GPHC_Y5V_6.3V-to-50V_8.pdf?src-supplier=Digi-Key, ComponentLink1URL=http://www.yageo.com/documents/recent/UPY-GPHC_Y5V_6.3V-to-50V_8.pdf?src-supplier=Digi-Key, ComponentLink2Description=http://www.yageo.com/documents/recent/UPY-GPHC_Y5V_6.3V-to-50V_5.pdf?src-supplier=Avnet+Europe, ComponentLink2URL=http://www.yageo.com/documents/recent/UPY-GPHC_Y5V_6.3V-to-50V_5.pdf?src-supplier=Avnet+Europe, ComponentLink3Description=https://www.verical.com/server-webapp/html/getDatasheet?partID=403611&src-supplier=Verical, ComponentLink3URL=https://www.verical.com/server-webapp/html/getDatasheet?partID=403611&src-supplier=Verical, ComponentLink4Description=http://www.mouser.com/ds/2/447/Yageo_UPY-GP_NP0_16V-to-50V_9-358835.pdf?src-supplier=Mouser, ComponentLink4URL=http://www.mouser.com/ds/2/447/Yageo_UPY-GP_NP0_16V-to-50V_9-358835.pdf?src-supplier=Mouser, ComponentLink5Description=http://www.farnell.com/datasheets/1132289.pdf?src-supplier=Element14, ComponentLink5URL=http://www.farnell.com/datasheets/1132289.pdf?src-supplier=Element14, Composition=Ceramic, Depth=0.8mm, Halogen Free="Halogen Free", Height=0.8mm, Item Type=Capacitor, Lead Free="Lead Free", Length=1.6mm, Manufacturer Part Number=CC0603ZRY5V9BB104, Mount="Surface Mount", Number of Pins=2, Packaging="Tape and Reel", Pricing 1="1=0.1, 10=0.075, 100=0.0334, 500=0.02386, 1000=0.01874 (USD)", Radiation Hardening=No, REACH SVHC="No SVHC", Stock 1=15000880, Supplier 1=Digi-Key, Termination=SMD/SMT, Thickness=0.035inch, Voltage Rating=50V, Voltage Rating (DC)=50V, Width=0.031inch
C7: library part CC0402KRX5R7BB105, "CAP CER 1UF 16V X5R 0402", Case Code (Imperial)=0402, Case Code (Metric)=1005, Dielectric=X5R, LCSC Part Number=C325464, Manufacturer=Yageo, Max Operating Temperature=85°C, Min Operating Temperature=-55°C, Supplier Part Number 1=311-1691-6-ND, Tolerance=10%, Voltage Rating=16V, Capacitance=1uF, Case/Package=0402, ComponentLink1Description=http://www.yageo.com/documents/recent/UPY-GPHC_X5R_4V-to-50V_12.pdf?src-supplier=Avnet+Europe, ComponentLink1URL=http://www.yageo.com/documents/recent/UPY-GPHC_X5R_4V-to-50V_12.pdf?src-supplier=Avnet+Europe, Composition=Ceramic, Depth=0.5mm, Halogen Free="Halogen Free", Height=0.5mm, Item Type=Capacitor, Lead Free="Lead Free", Length=1mm, Manufacturer Part Number=CC0402KRX5R7BB105, Mount="Surface Mount", Packaging="Tape and Reel", Pricing 1="1=0.36, 10=0.252, 100=0.1512, 500=0.1134, 1000=0.09576, 2500=0.09072, 5000=0.08568 (USD)", Radiation Hardening=No, Stock 1=1405667, Supplier 1=Digi-Key, Termination=SMD/SMT, Thickness=0.022inch, Voltage Rating (DC)=16V, Weight=2.3E-05oz, Width=0.02inch
C9: library part UWX1E101MCL1GB, "CAP ALUM 100UF 20% 25V SMD", Case/Package=Radial, Dielectric Material=Aluminium, LCSC Part Number=C125982, Leakage Current=3uA, Manufacturer=Nichicon, Max Operating Temperature=85°C, Min Operating Temperature=-40°C, Package Quantity=1000, Ripple Current=110mA, Supplier Part Number 1=493-2113-6-ND, Tolerance=20%, Voltage=25V, Capacitance=100uF, Category="Aluminum Electrolytic Capacitors", ComponentLink1Description=http://nichicon-us.com/english/products/pdfs/e-uwx.pdf?src-supplier=Digi-Key, ComponentLink1URL=http://nichicon-us.com/english/products/pdfs/e-uwx.pdf?src-supplier=Digi-Key, ComponentLink2Description=http://www.nichicon.co.jp/english/products/pdfs/e-ch_ref.pdf?src-supplier=Mouser, ComponentLink2URL=http://www.nichicon.co.jp/english/products/pdfs/e-ch_ref.pdf?src-supplier=Mouser, ComponentLink3Description=http://www.nichicon.co.jp/english/products/pdfs/e-wx.pdf?src-supplier=Avnet, ComponentLink3URL=http://www.nichicon.co.jp/english/products/pdfs/e-wx.pdf?src-supplier=Avnet, ComponentLink4Description=http://uk.rs-online.com/webdocs/0fa3/0900766b80fa3a90.pdf?src-supplier=RSComponents, ComponentLink4URL=http://uk.rs-online.com/webdocs/0fa3/0900766b80fa3a90.pdf?src-supplier=RSComponents, ComponentLink5Description=http://nichicon-us.com/english/products/pdfs/e-wx.pdf?src-supplier=Future+Electronics, ComponentLink5URL=http://nichicon-us.com/english/products/pdfs/e-wx.pdf?src-supplier=Future+Electronics, ComponentLink6Description=http://www.nichicon.co.jp/english/products/pdfs/e-ch_ref.pdf?src-supplier=Avnet+Europe, ComponentLink6URL=http://www.nichicon.co.jp/english/products/pdfs/e-ch_ref.pdf?src-supplier=Avnet+Europe, ComponentLink7Description=http://www.farnell.com/datasheets/2364658.pdf?src-supplier=Element14, ComponentLink7URL=http://www.farnell.com/datasheets/2364658.pdf?src-supplier=Element14, ComponentLink8Description=https://datasheet.ciiva.com/11778/0900766b80fa3a90-11778418.pdf?src-supplier=RSComponents, ComponentLink8URL=https://datasheet.ciiva.com/11778/0900766b80fa3a90-11778418.pdf?src-supplier=RSComponents, ComponentLink9Description=https://datasheet.ciiva.com/17527/e-wx-17527624.pdf?src-supplier=Avnet+Europe, ComponentLink9URL=https://datasheet.ciiva.com/17527/e-wx-17527624.pdf?src-supplier=Avnet+Europe, ComponentLink10Description=https://datasheet.ciiva.com/5361/e-wx-11809-5361100.pdf?src-supplier=Mouser, ComponentLink10URL=https://datasheet.ciiva.com/5361/e-wx-11809-5361100.pdf?src-supplier=Mouser, ComponentLink11Description=https://datasheet.ciiva.com/28458/1912851-28458684.pdf?src-supplier=Element14, ComponentLink11URL=https://datasheet.ciiva.com/28458/1912851-28458684.pdf?src-supplier=Element14, ComponentLink12Description=https://datasheet.ciiva.com/96/e-wx-96650.pdf?src-supplier=Digi-Key, ComponentLink12URL=https://datasheet.ciiva.com/96/e-wx-96650.pdf?src-supplier=Digi-Key, ComponentLink13Description=https://datasheet.ciiva.com/96/e-wx-96651.pdf?src-supplier=Digi-Key, ComponentLink13URL=https://datasheet.ciiva.com/96/e-wx-96651.pdf?src-supplier=Digi-Key, ComponentLink14Description=https://datasheet.ciiva.com/96/e-wx-96652.pdf?src-supplier=Digi-Key, ComponentLink14URL=https://datasheet.ciiva.com/96/e-wx-96652.pdf?src-supplier=Digi-Key, ComponentLink15Description=https://datasheet.ciiva.com/11687/e-wx-11687148.pdf?src-supplier=Avnet, ComponentLink15URL=https://datasheet.ciiva.com/11687/e-wx-11687148.pdf?src-supplier=Avnet, ComponentLink16Description=https://datasheet.ciiva.com/16512/e-wx-16512638.pdf?src-supplier=Future+Electronics, ComponentLink16URL=https://datasheet.ciiva.com/16512/e-wx-16512638.pdf?src-supplier=Future+Electronics, Construction=Cylindrical, Diameter=8mm, Dissipation Factor=0.14%, Height=5.4mm, Height - Seated (Max)=0.213inch, Item Type=Capacitor, Lead Diameter=0.8mm, Lead Free="Lead Free", Lead Pitch=2.3mm, Length=5.4mm, Life (Hours)=2000Hour, Manufacturer Part Number=UWX1E101MCL1GB, Mount="Surface Mount", Number of Pins=2, Packaging="Tape and Reel", Polarity=Polar, Pricing 1="1=0.43, 10=0.301, 50=0.211, 100=0.1808, 500=0.13558 (USD)", Pricing 2="1=0.43000, 10=0.30100, 50=0.21100, 100=0.18080, 500=0.13558 (USD)", Radiation Hardening=No, REACH SVHC="No SVHC", Ripple Current (AC)=110mA, RoHS=Yes, RoHS Compliant=Yes, Series=WX, Stock 1=30613, Stock 2=25010, Supplier 1=Digi-Key, Supplier 2=Digi-Key, Supplier Part Number 2=493-2113-1-ND, Termination=SMD/SMT, Voltage Rating=25V, Voltage Rating (DC)=25V, Weight=0.01lb, Width=0.25inch